# Altium PCB PCB_PowerBoard_7500-0430.PcbDoc (part 1 of 5)
Units mil, origin at the board's own origin, x right, y up, seen from the top; angles counter-clockwise.
Board outline 4000 x 3250 mil, 4 copper layers (Top Layer, Layer 1, Layer 2, Bottom Layer), stack 62.449 mil thick; 205 components, 100 nets, 1585 pads, 235 vias.
Unrouted connection lines stored in the file: 2.
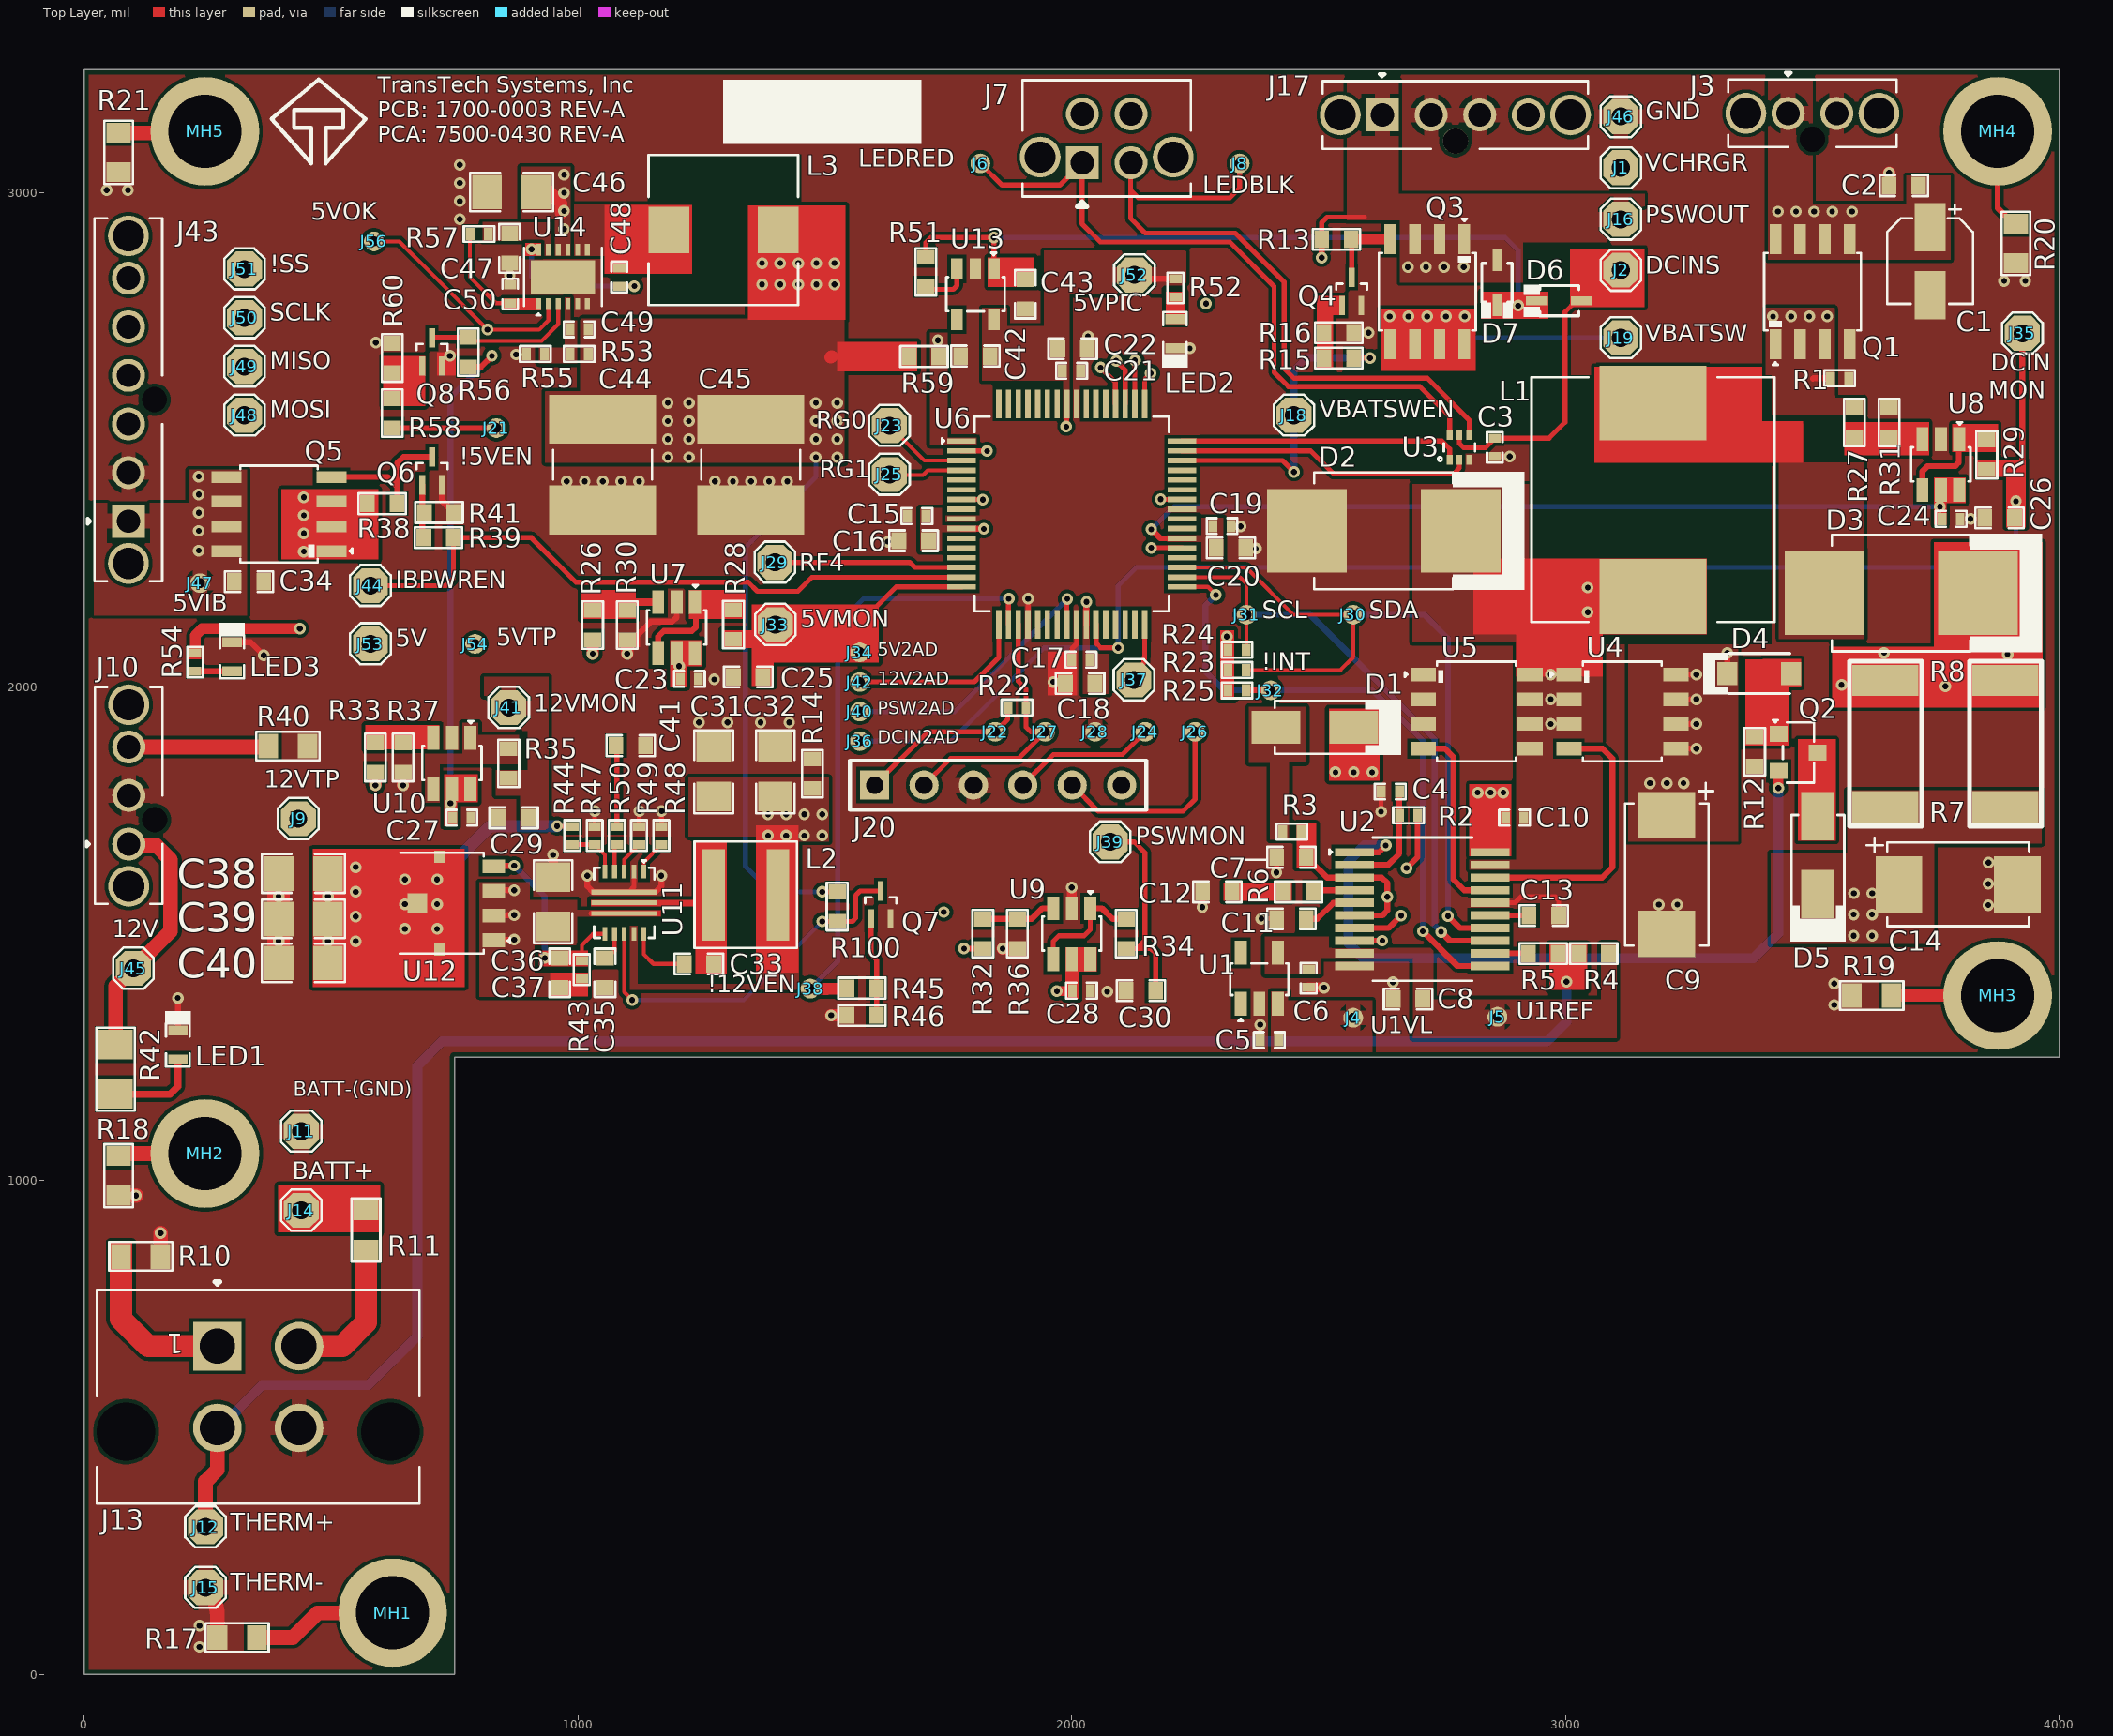
[diagram p0: Top Layer view]
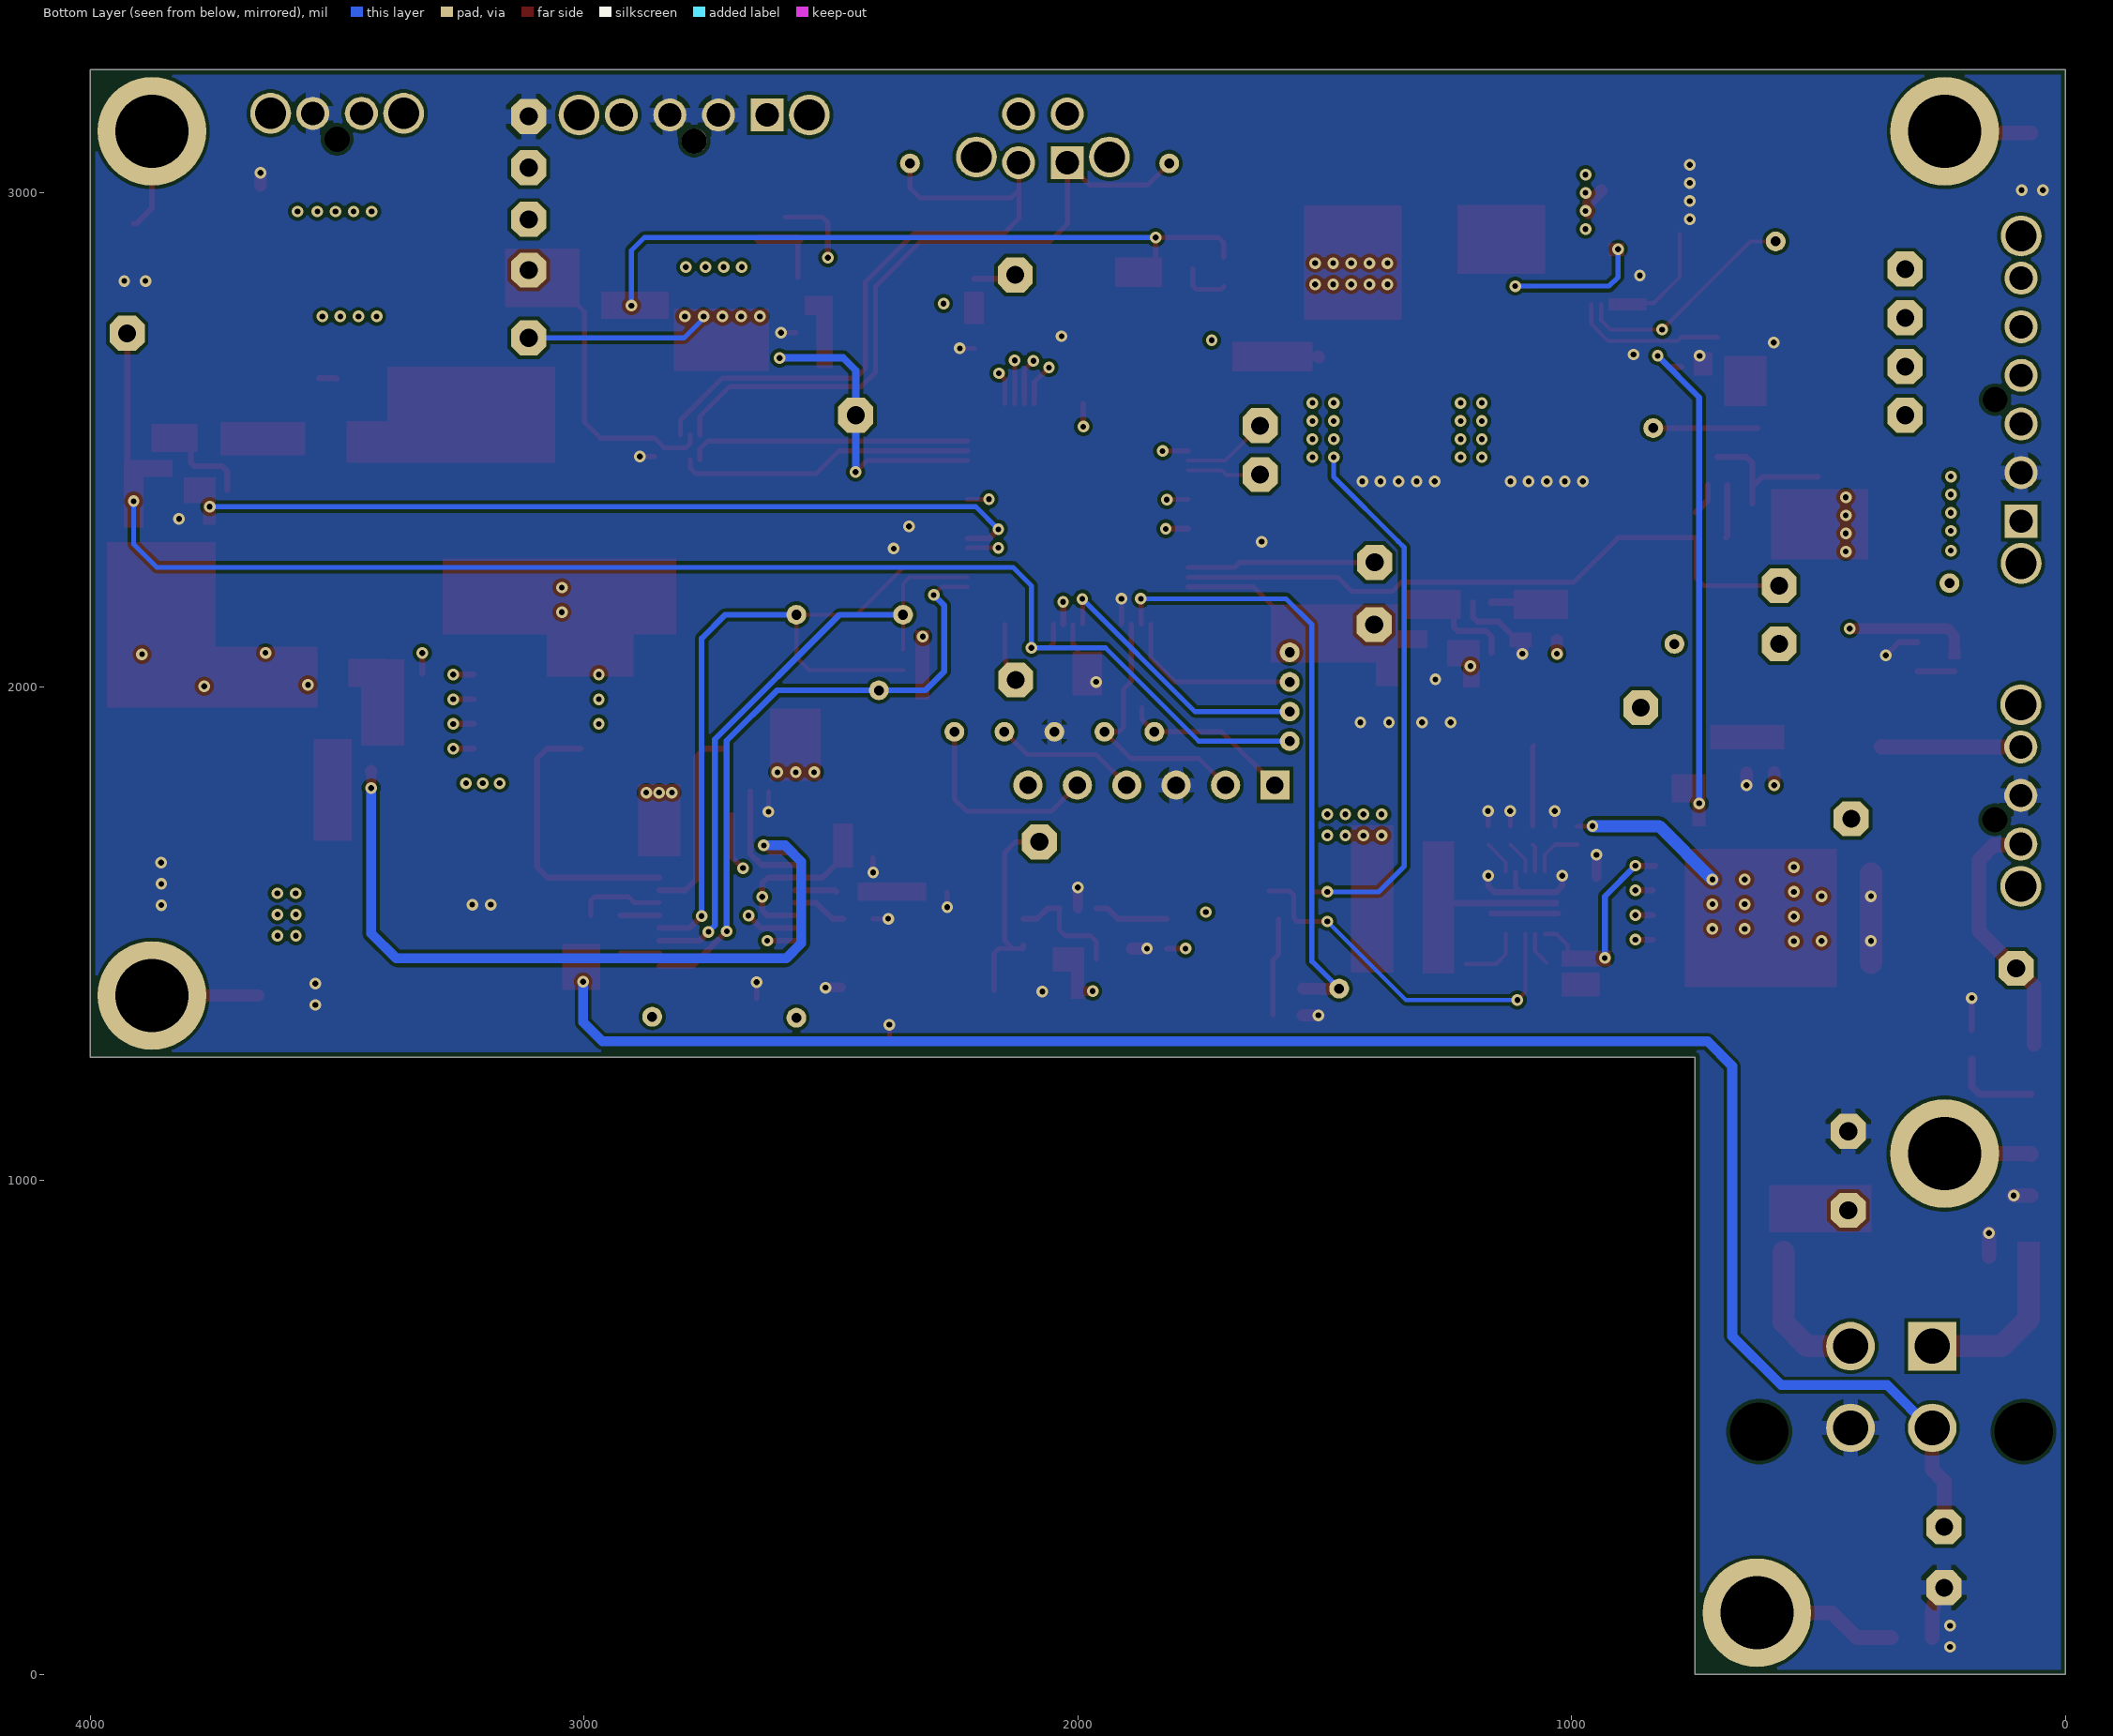
[diagram p1: Bottom Layer view, seen from below]
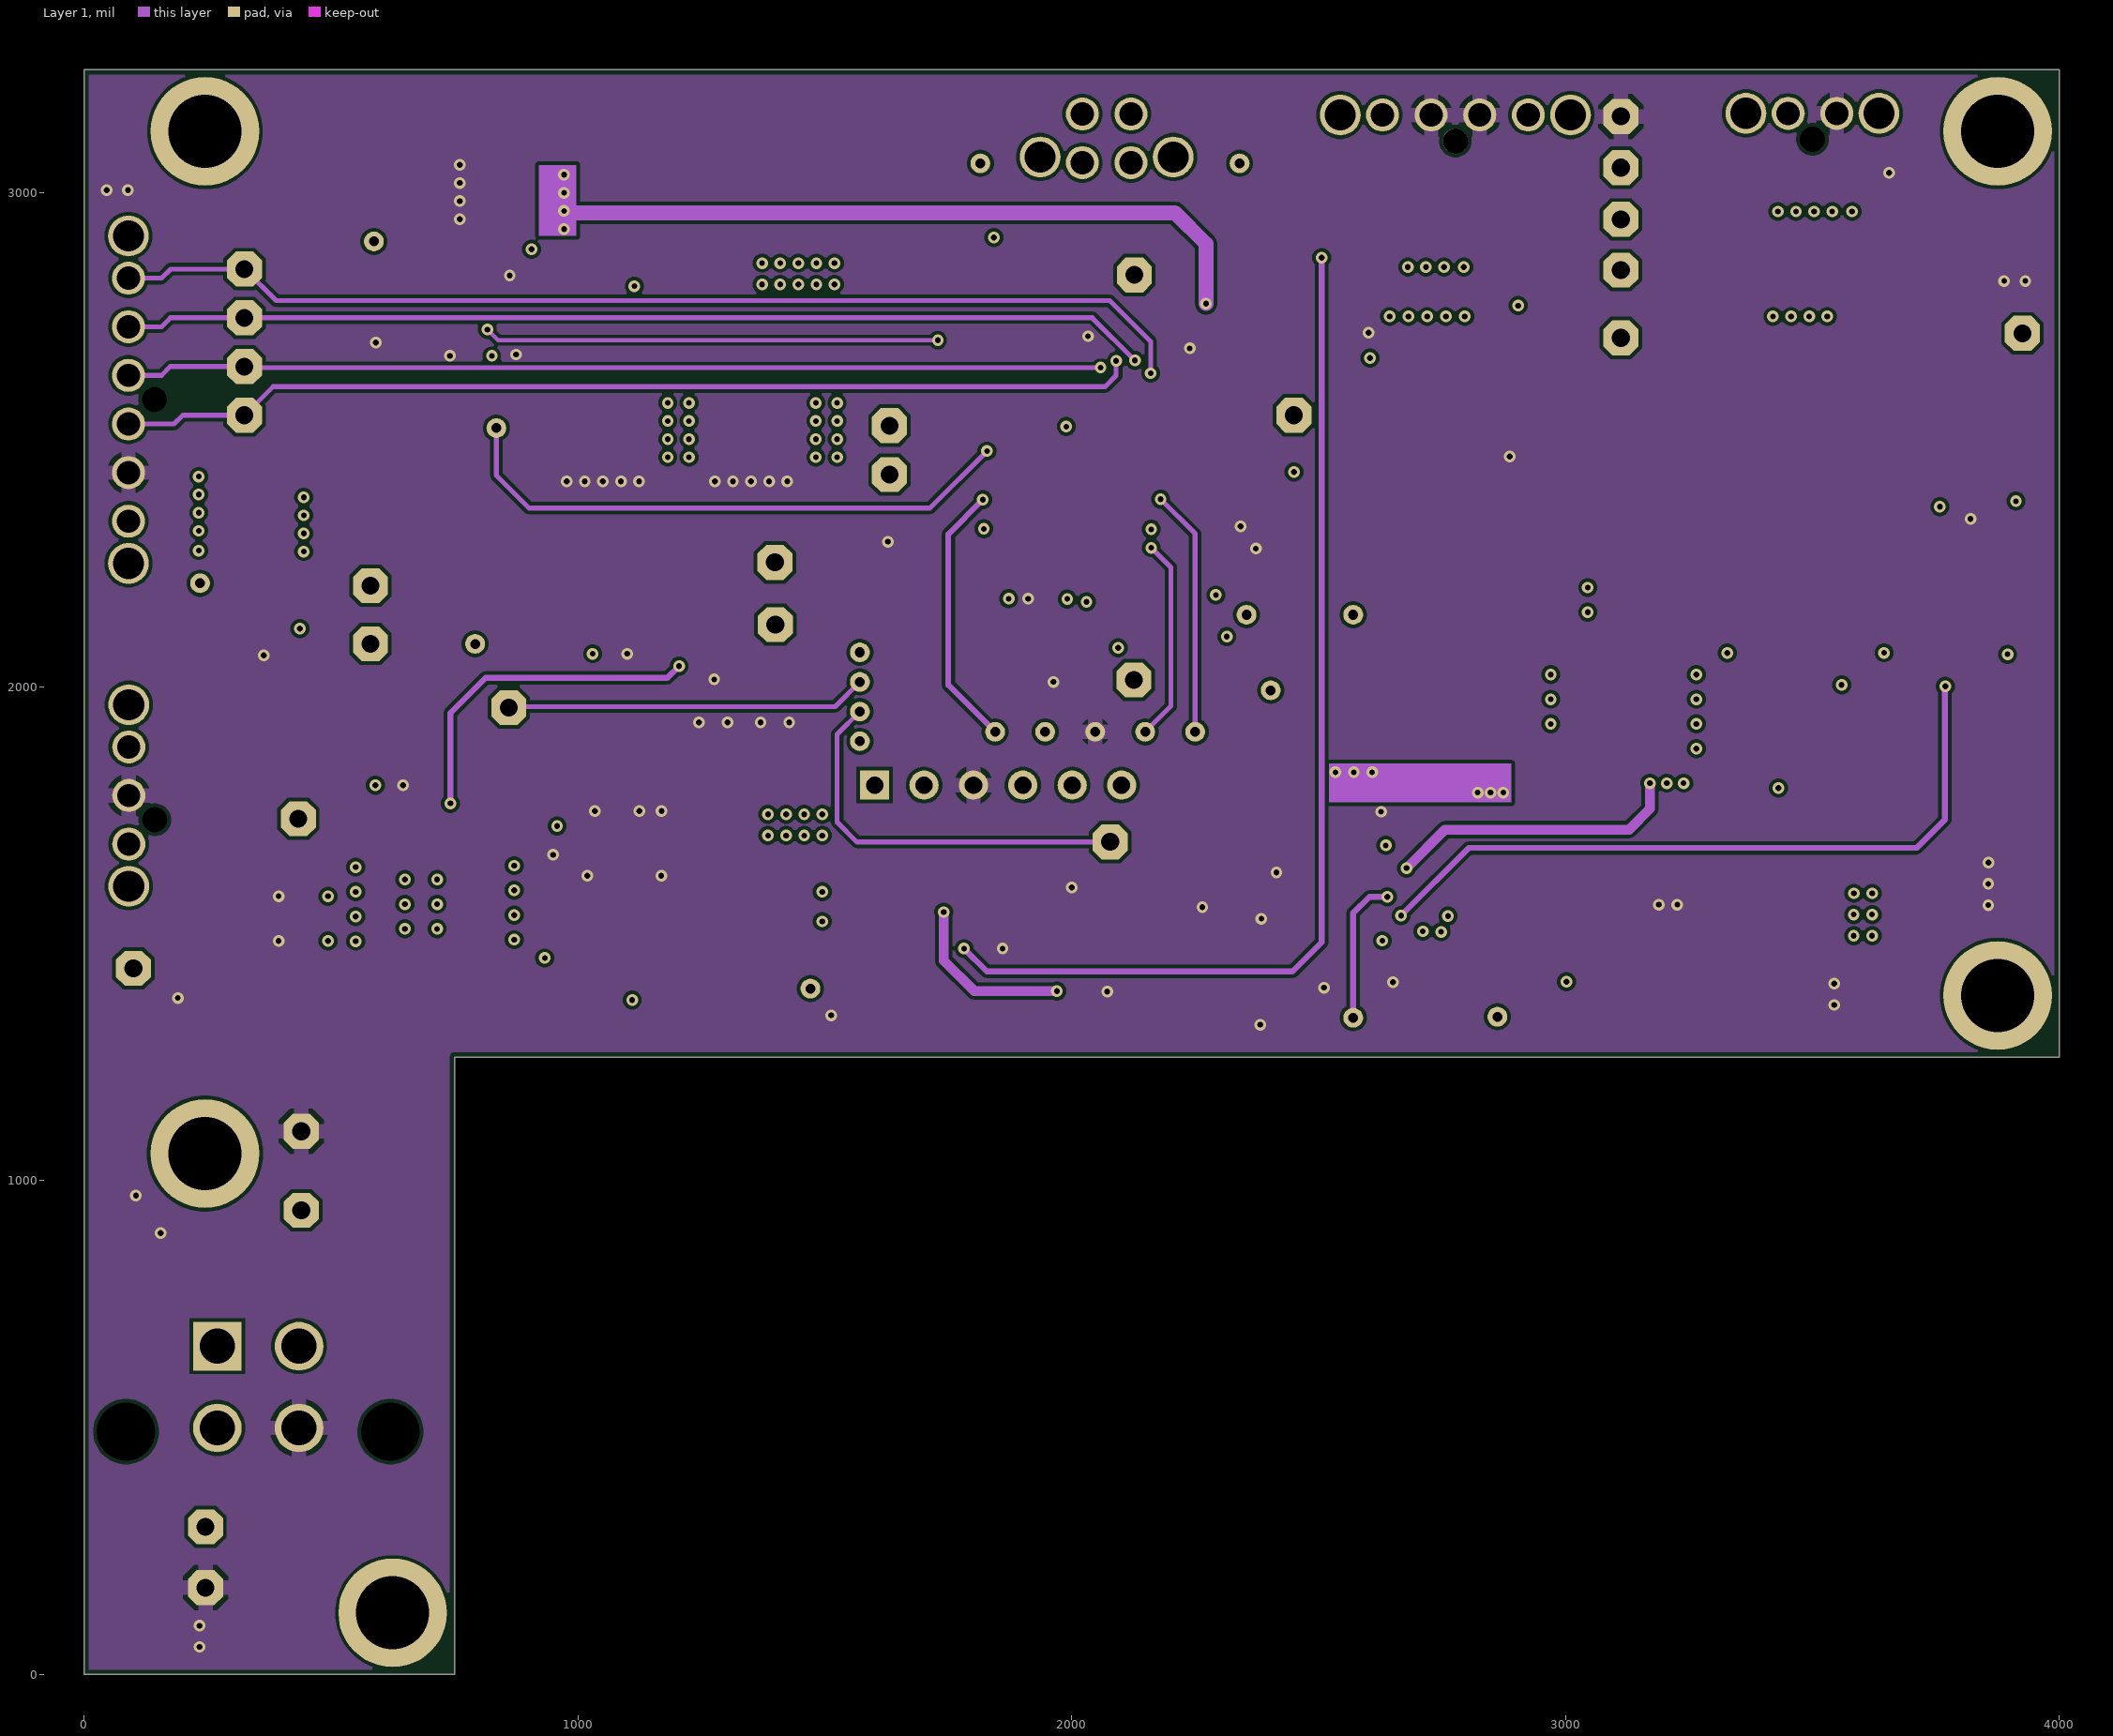
[diagram p2: Layer 1]
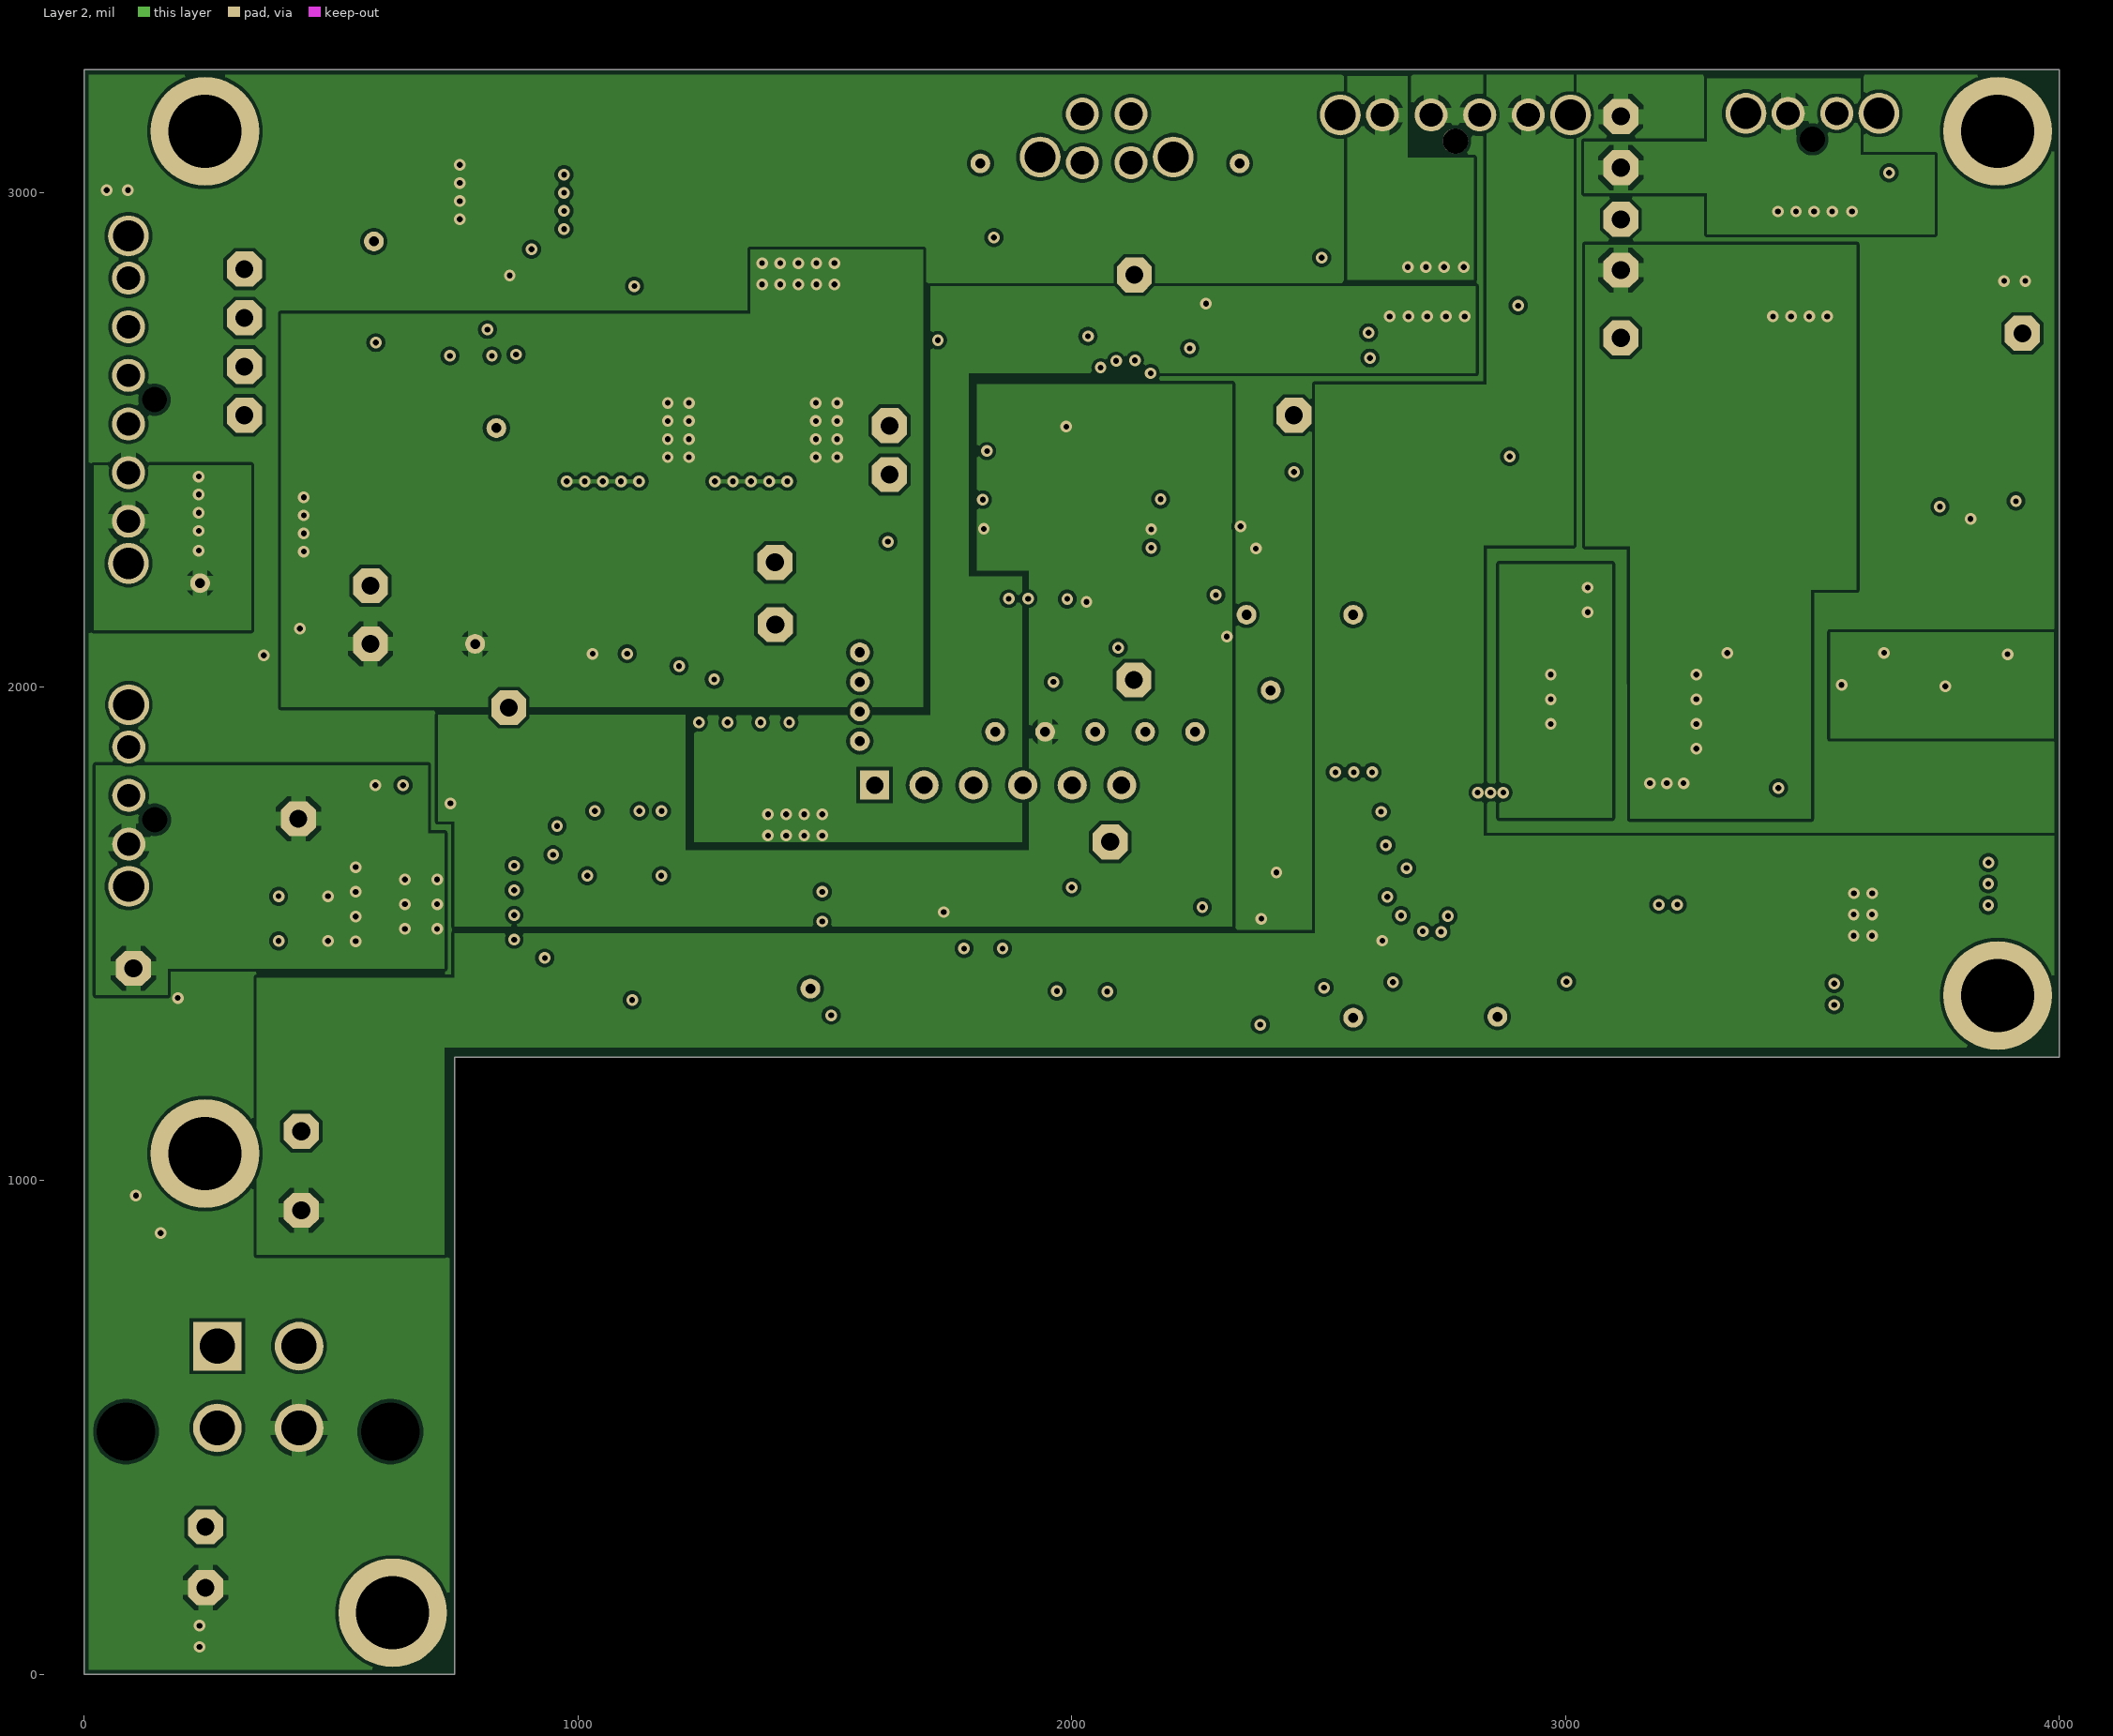
[diagram p3: Layer 2]
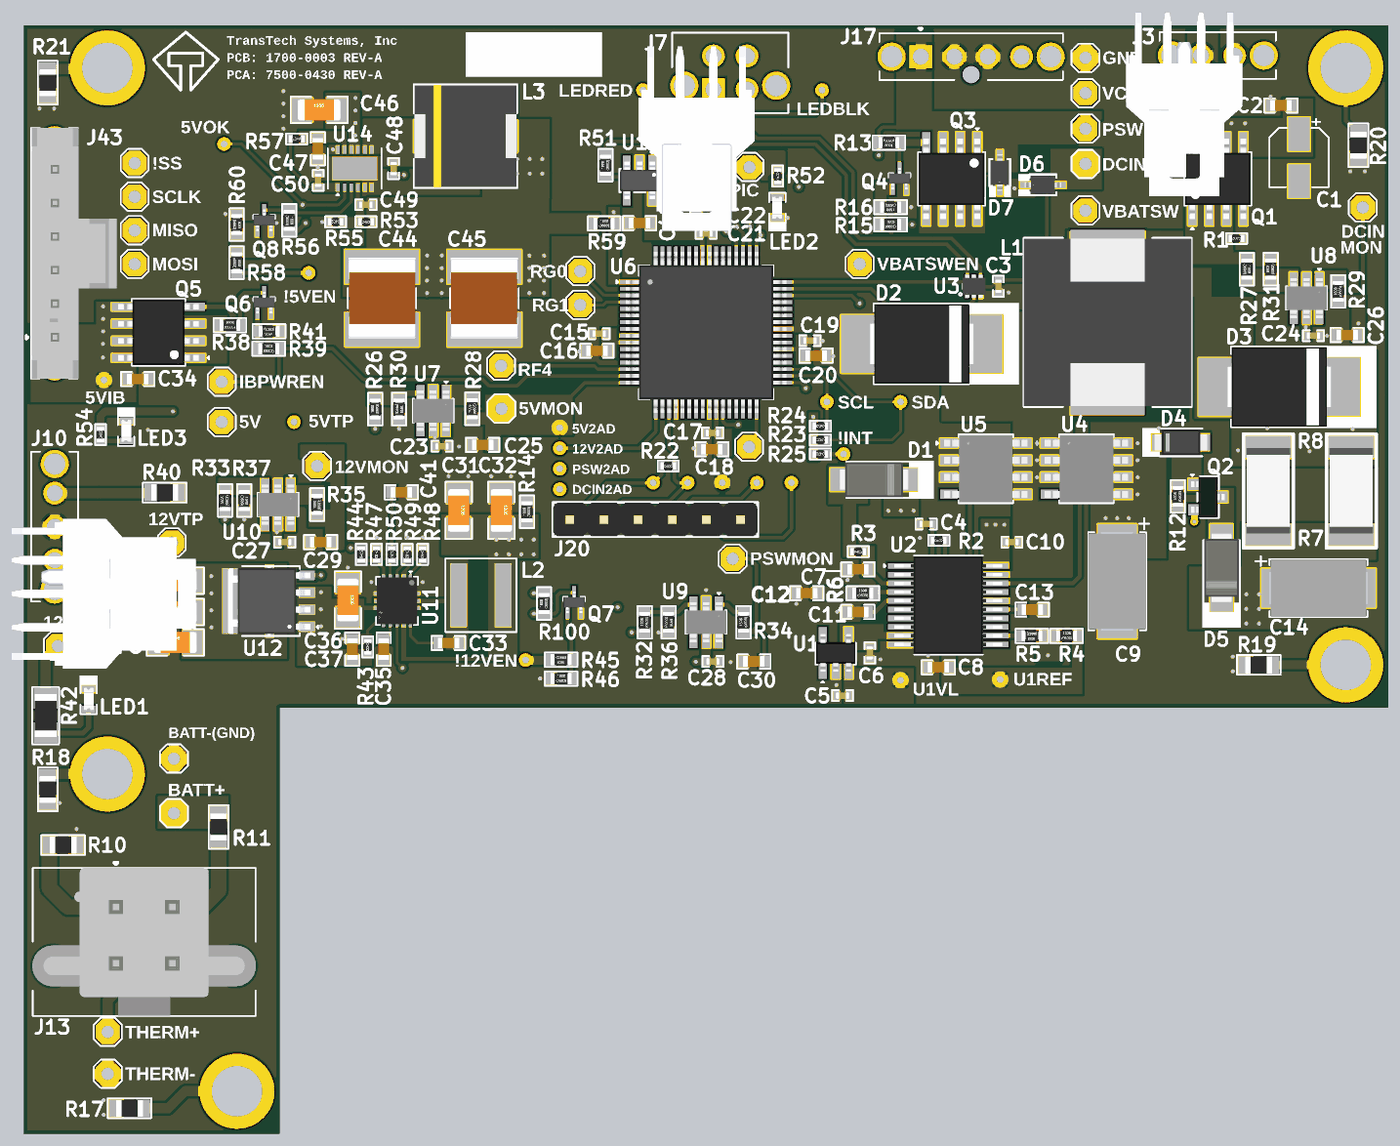
[diagram p6: 3D render of the assembled board from above, using the file's embedded part models]

## Layer stack, top to bottom
Top Solder: solder mask 0.4, Solder Resist, Dk 3.5
Top Layer: signal copper 1.378
Dielectric 2: prepreg 8.2839, PP-006, Dk 4.4
Layer 1: signal copper 0.598
Dielectric 1: core 41.9291, FR-4, Dk 4.6
Layer 2: signal copper 0.598
Dielectric 3: prepreg 8.2839, PP-006, Dk 4.4
Bottom Layer: signal copper 1.378
Bottom Solder: solder mask 0.4, Solder Resist, Dk 3.5

## Board outline
0,0 750,0 750,1250 4000,1250 4000,3250 0,3250

## Design rules (kind name [scope] priority, off if disabled: settings)
BoardOutlineClearance [All] p1: gap=0 ignorepadtopadclearanceinfootprint=FALSE except(10: Poly-OutlineEdge)
Clearance [All] p1: gap=7 ignorepadtopadclearanceinfootprint=FALSE except(0: Arc-Hole Track-Hole SMDPad-Hole THPad-Hole Via-Hole Fill-Hole Poly-Hole Region-Hole Text-Hole; 4: Arc-SMDPad Track-SMDPad SMDPad-SMDPad)
HoleSize [All] p1: absolutevalues=TRUE maxlimit=1000 minlimit=1 maxpercent=80.000 minpercent=20.000
HoleToHoleClearance [All] p1: gap=0 allowstackedmicrovias=TRUE
MinimumSolderMaskSliver [All] p1: minsoldermaskwidth=0
PolygonConnect [All] p1: thpad.connectstyle=Relief thpad.reliefconductorwidth=30 thpad.reliefentries=4 thpad.polygonreliefangle="90 Angle" thpad.airgapwidth=10 smdpad.connectstyle=Direct smdpad.reliefconductorwidth=10 smdpad.reliefentries=4 smdpad.polygonreliefangle="90 Angle" smdpad.airgapwidth=10 via.connectstyle=Direct via.reliefconductorwidth=10 via.reliefentries=4 via.polygonreliefangle="90 Angle" via.airgapwidth=10
RoutingVias [All] p1: holewidth=11.81 width=23.62 viastyle="Through Hole" minholewidth=11.81 minwidth=23.62 maxholewidth=11.81 maxwidth=23.62
SilkToSilkClearance [All] p1: silktosilkclearance=0
SilkToSolderMaskClearance [IsPad] p1: minsilkscreentomaskgap=0 clearancetoexposedcopper=TRUE
SolderMaskExpansion [All] p1: expansion=4 istentingtop=FALSE
UnRoutedNet [All] p1: checkbadconnections=TRUE
Width [All] p1: maxlimit=100 minlimit=8 preferedwidth=10
24 further rules are at their usual default settings.

## Classes and differential pairs
component class Regulator_Sheet: C31 C32 C33 C34 C35 C36 C37 C38 C39 C40 C41 C42 C43 C44 C45 C46 C47 C48 C49 C50 D6 D7 J9 J10 J43 J44 J45 J47 J48 J49 J50 J51 J52 J53 J54 J56 L2 L3 LED1 LED2 LED3 Q5 Q6 Q7 Q8 R38 R39 R40 R41 R42 R43 R44 R45 R46 R47 R48 R49 R50 R51 R52 R53 R54 R55 R56 R57 R58 R59 R60 R100 U11 U12 U13 U14
component class Power_Sheet: C1 C2 C3 C4 C5 C6 C7 C8 C9 C10 C11 C12 C13 C14 D1 D2 D3 D4 D5 J1 J2 J3 J4 J5 J6 J7 J8 J11 J12 J13 J14 J15 J16 J17 J18 J19 J46 L1 Q1 Q2 Q3 Q4 R1 R2 R3 R4 R5 R6 R7 R8 R10 R11 R12 R13 R14 R15 R16 U1 U2 U3 U4 U5
component class Controller_Sheet: C15 C16 C17 C18 C19 C20 C21 C22 C23 C24 C25 C26 C27 C28 C29 C30 J20 J21 J22 J23 J24 J25 J26 J27 J28 J29 J30 J31 J32 J33 J34 J35 J36 J37 J38 J39 J40 J41 J42 MH1 MH2 MH3 MH4 MH5 R17 R18 R19 R20 R21 R22 R23 R24 R25 R26 R27 R28 R29 R30 R31 R32 R33 R34 R35 R36 R37 U6 U7 U8 U9 U10

## Components (designator, comment, footprint, x,y, rotation, side; value= is the part's Value field where it differs from the comment)
C1 "10uF" EEEFK1E100R_ 3738,2862 r270 top locked
C2 "0.1uF" Cap-0603 3685,3015 r0 top locked
C3 "0.1uF" Cap-0402 2857,2485 r270 top locked value=100nF
C4 "0.1uF" Cap-0402 2645,1788 r180 top locked value=100nF
C5 "0.1uF" Cap-0402 2400,1285 r180 top locked value=100nF
C6 "0.1uF" Cap-0402 2480,1410 r270 top locked value=100nF
C7 "1uF" Cap-0603 2445,1655 r180 top locked
C8 "0.1uF" Cap-0603 2681,1368 r0 top locked
C9 "22uF" Case-D 3205,1620 r270 top locked
C10 "0.1uF" Cap-0402 2896.5,1735 r0 top locked value=100nF
C11 "47nF" Cap-0603 2445,1530 r0 top locked
C12 "0.1uF" Cap-0603 2295,1585 r180 top locked
C13 "22nF" Cap-0603 2956,1537 r180 top locked
C14 "47uF" Case-D 3795,1600 r0 top locked
C15 "0.1uF" Cap-0402 1686.5,2346 r180 top locked value=100nF
C16 "10uF" Cap-0603 1680,2296 r180 top locked
C17 "0.1uF" Cap-0402 2019,2055 r180 top locked value=100nF
C18 "10uF" Cap-0603 2017,2007 r180 top locked
C19 "0.1uF" Cap-0402 2304.5,2325.5 r0 top locked value=100nF
C20 "10uF" Cap-0603 2322.5,2281.5 r0 top locked
C21 "0.1uF" Cap-0402 2000,2640 r0 top locked value=100nF
C22 "10uF" Cap-0603 2002,2685 r0 top locked
C23 "0.1uF" Cap-0402 1226,2016 r0 top locked value=100nF
C24 "0.1uF" Cap-0402 3780.5,2340 r0 top locked value=100nF
C25 "0.1uF" Cap-0603 1345,2020 r180 top locked
C26 "0.1uF" Cap-0603 3879,2342 r180 top locked
C27 "0.1uF" Cap-0402 765,1735 r0 top locked value=100nF
C28 "0.1uF" Cap-0402 2020,1385 r0 top locked value=100nF
C29 "0.1uF" Cap-0603 870,1735 r180 top locked
C30 "0.1uF" Cap-0603 2140,1385 r180 top locked
C31 "22uF" Cap-1206 1275,1828 r270 top locked
C32 "22uF" Cap-1206 1400,1828 r270 top locked
C33 "0.1uF" Cap-0603 1245,1439 r0 top locked
C34 "10uF" Cap-0603 334,2213 r180 top locked
C35 "4.7uF" Cap-0603 1055,1421 r90 top locked
C36 "10uF" Cap-1206 950,1565 r270 top locked
C37 "22nF" Cap-0603 963,1421 r270 top locked
C38 "22uF" Cap-1206 444,1622 r0 top locked
C39 "22uF" Cap-1206 444,1530 r0 top locked
C40 "22uF" Cap-1206 444,1441 r0 top locked
C41 "220pF" Cap-0603 1107,1881 r180 top locked
C42 "4.7uF" Cap-0603 1805,2670 r0 top locked
C43 "1uF" Cap-0603 1906,2795 r90 top locked
C44 "47uF" "SMD 2 J_Lead" 1050,2450 r90 top locked
C45 "47uF" "SMD 2 J_Lead" 1350,2450 r90 top locked
C46 "22uF" Cap-1206 866,3002 r0 top locked
C47 "1uF" Cap-0603 862,2888 r90 top locked
C48 "0.1uF" Cap-0402 1084,2830 r90 top locked value=100nF
C49 "12pF" Cap-0402 1003,2724 r0 top locked
C50 "DNP" Cap-0402 863,2795.5 r270 top locked
D1 "ES1A-13-F" SMA 2492.26,1918 r180 top locked
D2 "B560CQ-13-F" SMC 2632,2316 r180 top locked
D3 "B560CQ-13-F" SMC 3680,2190 r180 top locked
D4 "BZD27C4V3P-E3-08" "DO-219AB (SMF)" 3392,2027 r180 top locked
D5 "ES1A-13-F" SMA 3511,1659.26 r90 top locked
D6 "1SS404,H3F" USC 2988,2776 r0 top locked
D7 "1SS404,H3F" USC 2867,2819 r90 top locked
J1 "Test Point -TH 1.8mm Hole size 0.92mm" "Test Point -TH 1.8mm Hole size 0.92mm"#1 3112,3051.33 r180 top locked
J2 "Test Point -TH 1.8mm Hole size 0.92mm" "Test Point -TH 1.8mm Hole size 0.92mm"#1 3112,2844 r180 top locked
J3 "1053111302" 1053111302 3500,3135 r0 top locked
J4 "Test Point -TH 1.8mm Hole size 0.92mm" "Test Point -TH 1.8mm Hole size 0.92mm"#2 2570,1330 r0 top locked
J5 "Test Point -TH 1.8mm Hole size 0.92mm" "Test Point -TH 1.8mm Hole size 0.92mm"#2 2862,1332 r0 top locked
J6 "Test Point -TH 1.8mm Hole size 0.92mm" "Test Point -TH 1.8mm Hole size 0.92mm"#2 1815,3060 r0 top locked
J7 "105312-1304" 105312-1304 2070.79,3110.79 r0 top
J8 "Test Point -TH 1.8mm Hole size 0.92mm" "Test Point -TH 1.8mm Hole size 0.92mm"#2 2340,3060 r0 top locked
J9 "Test Point -TH 1.8mm Hole size 0.92mm" "Test Point -TH 1.8mm Hole size 0.92mm"#1 434,1733 r0 top locked
J10 "105311-1303" 1053111303 117,1780 r90 top locked
J11 "Test Point -TH 1.8mm Hole size 0.92mm" "Test Point -TH 1.8mm Hole size 0.92mm"#1 440,1100 r0 top locked
J12 "Test Point -TH 1.8mm Hole size 0.92mm" "Test Point -TH 1.8mm Hole size 0.92mm"#1 246,299 r0 top locked
J13 "0462075004" 0462075004 352.72,578.44 r180 top locked
J14 "Test Point -TH 1.8mm Hole size 0.92mm" "Test Point -TH 1.8mm Hole size 0.92mm"#1 440,940 r0 top locked
J15 "Test Point -TH 1.8mm Hole size 0.92mm" "Test Point -TH 1.8mm Hole size 0.92mm"#1 246,176 r0 top locked
J16 "Test Point -TH 1.8mm Hole size 0.92mm" "Test Point -TH 1.8mm Hole size 0.92mm"#1 3112,2946.67 r0 top locked
J17 "105311-1304" 1053111304 2776.93,3131.62 r0 top
J18 "Test Point -TH 1.8mm Hole size 0.92mm" "Test Point -TH 1.8mm Hole size 0.92mm"#1 2450,2550 r0 top locked
J19 "Test Point -TH 1.8mm Hole size 0.92mm" "Test Point -TH 1.8mm Hole size 0.92mm"#1 3112,2706.67 r0 top locked
J20 "X6511WV-06H-C60D30" HDR1X6_ 1601,1801 r0 top
J21 "Test Point -TH 1.8mm Hole size 0.92mm" "Test Point -TH 1.8mm Hole size 0.92mm"#2 835,2524 r0 top locked
J22 "Test Point -TH 1.8mm Hole size 0.92mm" "Test Point -TH 1.8mm Hole size 0.92mm"#2 1845,1909 r0 top locked
J23 "Test Point -TH 1.8mm Hole size 0.92mm" "Test Point -TH 1.8mm Hole size 0.92mm"#1 1631,2529 r0 top locked
J24 "Test Point -TH 1.8mm Hole size 0.92mm" "Test Point -TH 1.8mm Hole size 0.92mm"#2 2148.75,1909 r0 top locked
J25 "Test Point -TH 1.8mm Hole size 0.92mm" "Test Point -TH 1.8mm Hole size 0.92mm"#1 1631,2430 r0 top locked
J26 "Test Point -TH 1.8mm Hole size 0.92mm" "Test Point -TH 1.8mm Hole size 0.92mm"#3 1865,1890 r0 top locked
J27 "Test Point -TH 1.8mm Hole size 0.92mm" "Test Point -TH 1.8mm Hole size 0.92mm"#2 1946.25,1909 r0 top locked
J28 "Test Point -TH 1.8mm Hole size 0.92mm" "Test Point -TH 1.8mm Hole size 0.92mm"#2 2047.5,1909 r0 top locked
J29 "Test Point -TH 1.8mm Hole size 0.92mm" "Test Point -TH 1.8mm Hole size 0.92mm"#1 1399,2252 r0 top locked
J30 "Test Point -TH 1.8mm Hole size 0.92mm" "Test Point -TH 1.8mm Hole size 0.92mm"#2 2570,2146 r0 top locked
J31 "Test Point -TH 1.8mm Hole size 0.92mm" "Test Point -TH 1.8mm Hole size 0.92mm"#2 2354,2146 r0 top locked
J32 "Test Point -TH 1.8mm Hole size 0.92mm" "Test Point -TH 1.8mm Hole size 0.92mm"#2 2403,1993 r0 top locked
J33 "Test Point -TH 1.8mm Hole size 0.92mm" "Test Point -TH 1.8mm Hole size 0.92mm"#1 1400,2126 r0 top locked
J34 "Test Point -TH 1.8mm Hole size 0.92mm" "Test Point -TH 1.8mm Hole size 0.92mm"#2 1571,2070 r0 top locked
J35 "Test Point -TH 1.8mm Hole size 0.92mm" "Test Point -TH 1.8mm Hole size 0.92mm"#1 3925,2716 r0 top locked
J36 "Test Point -TH 1.8mm Hole size 0.92mm" "Test Point -TH 1.8mm Hole size 0.92mm"#2 1571,1890 r0 top locked
J37 "Test Point -TH 1.8mm Hole size 0.92mm" "Test Point -TH 1.8mm Hole size 0.92mm"#1 2126,2014 r0 top locked
J38 "Test Point -TH 1.8mm Hole size 0.92mm" "Test Point -TH 1.8mm Hole size 0.92mm"#2 1471,1389 r0 top
J39 "Test Point -TH 1.8mm Hole size 0.92mm" "Test Point -TH 1.8mm Hole size 0.92mm"#1 2078,1686 r0 top locked
J40 "Test Point -TH 1.8mm Hole size 0.92mm" "Test Point -TH 1.8mm Hole size 0.92mm"#2 1571,1950 r0 top locked
J41 "Test Point -TH 1.8mm Hole size 0.92mm" "Test Point -TH 1.8mm Hole size 0.92mm"#1 860,1958 r0 top locked
J42 "Test Point -TH 1.8mm Hole size 0.92mm" "Test Point -TH 1.8mm Hole size 0.92mm"#2 1571,2010 r0 top locked
J43 "105311-1206" 1053111206 116.38,2581.5 r90 top locked
J44 "Test Point -TH 1.8mm Hole size 0.92mm" "Test Point -TH 1.8mm Hole size 0.92mm"#1 580,2205 r0 top locked
J45 "Test Point -TH 1.8mm Hole size 0.92mm" "Test Point -TH 1.8mm Hole size 0.92mm"#1 100,1430 r0 top locked
J46 "Test Point -TH 1.8mm Hole size 0.92mm" "Test Point -TH 1.8mm Hole size 0.92mm"#1 3112,3155 r180 top locked
J47 "Test Point -TH 1.8mm Hole size 0.92mm" "Test Point -TH 1.8mm Hole size 0.92mm"#4 229,2193 r0 top locked
J48 "Test Point -TH 1.8mm Hole size 0.92mm" "Test Point -TH 1.8mm Hole size 0.92mm"#1 325,2550 r0 top locked
J49 "Test Point -TH 1.8mm Hole size 0.92mm" "Test Point -TH 1.8mm Hole size 0.92mm"#1 325,2648.67 r0 top locked
J50 "Test Point -TH 1.8mm Hole size 0.92mm" "Test Point -TH 1.8mm Hole size 0.92mm"#1 325,2747.33 r0 top locked
J51 "Test Point -TH 1.8mm Hole size 0.92mm" "Test Point -TH 1.8mm Hole size 0.92mm"#1 325,2846 r0 top locked
J52 "Test Point -TH 1.8mm Hole size 0.92mm" "Test Point -TH 1.8mm Hole size 0.92mm"#1 2127,2834 r0 top locked
J53 "Test Point -TH 1.8mm Hole size 0.92mm" "Test Point -TH 1.8mm Hole size 0.92mm"#1 580,2087 r0 top locked
J54 "Test Point -TH 1.8mm Hole size 0.92mm" "Test Point -TH 1.8mm Hole size 0.92mm"#2 792,2087 r0 top locked
J56 "Test Point -TH 1.8mm Hole size 0.92mm" "Test Point -TH 1.8mm Hole size 0.92mm"#2 587,2902 r0 top locked
L1 "22uH" DR127-220-R 3177,2379 r90 top locked
L2 "1.2uH" XAL5030-122MEC 1340,1579 r180 top locked
L3 "3.3uH" DRA74-3R3-R 1295,2925 r0 top locked
LED1 "Emerald" LED-0603 190,1275 r90 top locked
LED2 "Emerald" LED-0603 2209,2715 r270 top locked
LED3 "Emerald" LED-0603 300,2061 r90 top locked
MH1 "4-40 Panhead Mounting Holes" "4-40 Panhead Mounting Holes"#1 625,125 r0 top locked
MH2 "4-40 Panhead Mounting Holes" "4-40 Panhead Mounting Holes"#2 1705,195 r0 top locked
MH3 "4-40 Panhead Mounting Holes" "4-40 Panhead Mounting Holes"#1 3875,1375 r0 top locked
MH4 "4-40 Panhead Mounting Holes" "4-40 Panhead Mounting Holes"#1 3875,3125 r0 top locked
MH5 "4-40 Panhead Mounting Holes" "4-40 Panhead Mounting Holes"#3 1125,600 r0 top locked
Q1 "AO4485" SOIC-8 3500,2800 r90 top locked
Q2 "BC807-40" SOT-23 3471,1867 r270 top
Q3 "AO4485" SOIC-8 2720,2800 r270 top locked
Q4 "MMBT2222ATT3G" MMBT2222ATT3G 2586.68,2772.31 r90 top locked
Q5 "AO4485" SOIC-8 395,2350 r180 top locked
Q6 "MMBT2222ATT3G" MMBT2222ATT3G 724.37,2409 r90 top locked
Q7 "MMBT2222ATT3G" MMBT2222ATT3G 1633,1530 r90 top locked
Q8 "MMBT2222ATT3G" MMBT2222ATT3G 724.37,2650 r90 top locked
R1 "10K" Res-0402 3555,2625 r180 top
R2 "10R" Res-0402 2682,1740 r0 top
R3 "10R" Res-0402 2446,1707 r0 top
R4 "10K" Res-0603 3057,1460 r180 top locked value=10kR
R5 "10K" Res-0603 2955,1460 r0 top locked value=10kR
R6 "10K" Res-0603 2459,1585 r180 top locked value=10kR
R7 "90mR" RES-2512 3648,1885 r270 top locked
R8 "90mR" RES-2512 3891,1885 r270 top locked
R10 "0R" Res-0805 115,846.69 r180 top locked
R11 "0R" Res-0805 571,900 r270 top locked
R12 "10K" Res-0603 3383,1869 r270 top value=10kR
R13 "10K" Res-0603 2536,2906 r0 top locked value=10kR
R14 "10K" Res-0603 1475,1824 r270 top locked value=10kR
R15 "1K" Res-0603 2541,2666 r180 top locked
R16 "10K" Res-0603 2541,2717 r0 top locked value=10kR
R17 "0R" Res-0805 310,75 r0 top locked
R18 "0R" Res-0805 70,1010 r90 top locked
R19 "0R" Res-0805 3620,1375 r0 top locked
R20 "0R" Res-0805 3912,2898 r90 top locked
R21 "0R" Res-0805 70,3082 r90 top locked
R22 "10K" Res-0402 1889,1958 r0 top locked
R23 "10K" Res-0402 2335,2034 r180 top locked
R24 "10K" Res-0402 2335,2075 r180 top locked
R25 "10K" Res-0402 2335,1993 r180 top locked
R26 "10K" Res-0603 1030,2125 r270 top locked value=10kR
R27 "30K" Res-0603 3585,2535 r90 top
R28 "100R" Res-0603 1315,2126 r270 top locked
R29 "100R" Res-0603 3853,2470 r270 top locked
R30 "15K" Res-0603 1100,2125 r90 top locked value=15kR
R31 "10K" Res-0603 3655,2535 r270 top locked value=10kR
R32 "18K" Res-0603 1820,1500 r270 top locked
R33 "30K" Res-0603 590,1857 r270 top
R34 "100R" Res-0603 2110,1500 r270 top locked
R35 "100R" Res-0603 860,1845 r270 top locked
R36 "10K" Res-0603 1890,1500 r90 top locked value=10kR
R37 "10K" Res-0603 646,1857 r90 top value=10kR
R38 "10K" Res-0603 604,2371 r180 top locked value=10kR
R39 "1K" Res-0603 718,2302 r180 top locked
R40 "0R" Res-0805 413,1880 r180 top locked
R41 "10K" Res-0603 719,2353 r0 top locked value=10kR
R42 "4.64K" Res-1206 64,1226 r90 top locked
R43 "133K" Res-0402 1008,1427.5 r270 top locked
R44 "732K" Res-0402 989,1699.03 r90 top locked
R45 "1K" Res-0603 1575,1390 r0 top locked
R46 "10K" Res-0603 1575,1335 r180 top locked value=10kR
R47 "80.6K" Res-0402 1034,1699.03 r270 top locked
R48 "174K" Res-0402 1169,1699.03 r270 top locked
R49 "86.6K" Res-0402 1124,1699.03 r270 top locked
R50 "133K" Res-0402 1079,1699.03 r270 top locked
R51 "10K" Res-0603 1705,2840 r270 top locked value=10kR
R52 "1.15K" Res-0402 2210,2808 r90 top locked
R53 "499K" Res-0402 1003,2674 r0 top locked
R54 "1.15K" Res-0402 225,2050 r90 top locked
R55 "95.3K" Res-0402 914,2674 r180 top locked
R56 "10K" Res-0603 778,2678 r90 top locked value=10kR
R57 "DNP" Res-0402 800,2917 r180 top locked
R58 "1K" Res-0603 624,2554 r90 top locked
R59 "10K" Res-0603 1701,2669 r180 top locked value=10kR
R60 "10K" Res-0603 624,2666 r90 top locked value=10kR
R100 "10K" Res-0603 1525,1555 r270 top locked value=10kR
U1 "ADR364AUJZ-REEL7" TSOT-23-5 2380,1410 r90 top locked
U2 "MAX1647EAP+" SSOP-20-208mil 2710,1550 r0 top locked
U3 "DRV8220DRLR" SOT-563 2785,2485 r90 top locked
U4 "DMS3015SSS-13" SOP-8 3115,1950 r0 top locked
U5 "DMS3015SSS-13" SOP-8 2820,1950 r0 top locked
U6 "PIC18F6627T-E/PT" "64-TQFP (10x10)" 2000,2350 r0 top locked
U7 "OPA363AIDBVR" SOT-23-6 1200,2120 r270 top locked
U8 "OPA363AIDBVR" SOT-23-6 3760,2450 r270 top locked
U9 "OPA363AIDBVR" SOT-23-6 2000,1500 r270 top locked
U10 "OPA363AIDBVR" SOT-23-6 745,1845 r270 top locked
U11 "TPS611781RNWT" VQFN-13-HR(3x3.5) 1094,1562.65 r270 top locked
U12 "SI7145DP-T1-GE3" PowerPAK-SO-8 752.54,1562 r180 top locked
U13 "LD2981CM50TR" SOT-23-5 1805,2795 r270 top locked
U14 "ISL85005AFRZ-T7A" "12-DFN (4x3)" 970,2830 r90 top locked

## Footprints (in the part's own frame and the unit in brackets; to place one, negate y for a bottom-side part, rotate by r counter-clockwise, add the part's x,y. Pads: shape width x height; smd on the part's side, far side on the other; paste and mask are expansions set on the pad)
"4-40 Panhead Mounting Holes"#1 [mil]
  round 220 hole 148: MH(0,0)
"4-40 Panhead Mounting Holes"#2 [mil]
  round 220 hole 148: MH(-1460,860)
"4-40 Panhead Mounting Holes"#3 [mil]
  round 220 hole 148: MH(-880,2525)
"12-DFN (4x3)" [mm]
  rect 0.6x0.25 smd paste+0 mask+0.051: 1(-1.4,1.25) 2(-1.4,0.75) 3(-1.4,0.25) 4(-1.4,-0.25) 5(-1.4,-0.75) 6(-1.4,-1.25) 7(1.4,-1.25) 8(1.4,-0.75) 9(1.4,-0.25) 10(1.4,0.25) 11(1.4,0.75) 12(1.4,1.25)
  rect 1.7x3.3 smd paste+0 mask+0.051: 13(0,0)
  silkscreen extent -1.98,-2 1.5,2
"64-TQFP (10x10)" [mm]
  rect 1.47x0.28 smd: 1(-5.67,3.75) 2(-5.67,3.25) 3(-5.67,2.75) 4(-5.67,2.25) 5(-5.67,1.75) 6(-5.67,1.25) 7(-5.67,0.75) 8(-5.67,0.25) 9(-5.67,-0.25) 10(-5.67,-0.75) 11(-5.67,-1.25) 12(-5.67,-1.75) 13(-5.67,-2.25) 14(-5.67,-2.75) 15(-5.67,-3.25) 16(-5.67,-3.75) 33(5.67,-3.75) 34(5.67,-3.25) 35(5.67,-2.75) 36(5.67,-2.25) 37(5.67,-1.75) 38(5.67,-1.25) 39(5.67,-0.75) 40(5.67,-0.25) 41(5.67,0.25) 42(5.67,0.75) 43(5.67,1.25) 44(5.67,1.75) 45(5.67,2.25) 46(5.67,2.75) 47(5.67,3.25) 48(5.67,3.75)
  rect 0.28x1.47 smd: 17(-3.75,-5.67) 18(-3.25,-5.67) 19(-2.75,-5.67) 20(-2.25,-5.67) 21(-1.75,-5.67) 22(-1.25,-5.67) 23(-0.75,-5.67) 24(-0.25,-5.67) 25(0.25,-5.67) 26(0.75,-5.67) 27(1.25,-5.67) 28(1.75,-5.67) 29(2.25,-5.67) 30(2.75,-5.67) 31(3.25,-5.67) 32(3.75,-5.67) 49(3.75,5.67) 50(3.25,5.67) 51(2.75,5.67) 52(2.25,5.67) 53(1.75,5.67) 54(1.25,5.67) 55(0.75,5.67) 56(0.25,5.67) 57(-0.25,5.67) 58(-0.75,5.67) 59(-1.25,5.67) 60(-1.75,5.67) 61(-2.25,5.67) 62(-2.75,5.67) 63(-3.25,5.67) 64(-3.75,5.67)
  silkscreen extent -6.68,-5 5,5, body extent -5.99,-5.99 5.99,5.99, height 1.2
105312-1304 [mm]
  rect 1.7x1.7 / inner round 1.7 / far side rect 1.7x1.7 hole 1.2 mask+0.076: 1(-1.25,-1.25)
  round 1.7 hole 1.2 mask+0.076: 2(1.25,-1.25) 3(-1.25,1.25) 4(1.25,1.25)
  round 2.1 hole 1.6 mask+0.076: S1(-3.42,-0.96) S2(3.42,-0.96)
  silkscreen extent -4.33,-3.53 4.33,2.99, body extent -4.33,-5.85 4.33,2.99, height 10.51
0462075004 [mm]
  rect 2.5x2.5 hole 1.8 mask+0.076: 1(2.1,-2.195)
  round 2.5 hole 1.8 mask+0.076: 2(-2.1,-2.195) 3(2.1,2.004) 4(-2.1,2.004)
  round 0 hole 3 unplated mask+0.076: ""(-6.8,2.195) ""(6.8,2.195)
  silkscreen extent -8.3,-5.51 8.3,5.9, body extent -8.33,-5.1 8.33,5.9, height 13.8
1053111206 [mm]
  rect 1.7x1.7 / inner round 1.7 / far side rect 1.7x1.7 hole 1.2 mask+0.076: 1(-6.25,0.67)
  round 1.7 hole 1.2 mask+0.076: 2(-3.75,0.67) 3(-1.25,0.67) 4(1.25,0.67) 5(3.75,0.67) 6(6.25,0.67)
  round 2.1 hole 1.6 mask+0.076: S1(-8.42,0.67) S2(8.42,0.67)
  round 0 hole 1.3 unplated mask+0.076: ""(0,-0.67)
  silkscreen extent -9.33,-1.07 9.33,2.77, body extent -9.33,-3.97 9.33,2.37, height 10.53
1053111302 [mm]
  round 1.7 hole 1.2 mask+0.076: 1(-1.25,0.67) 2(1.25,0.67)
  round 2.1 hole 1.6 mask+0.076: S1(-3.42,0.67) S2(3.42,0.67)
  round 0 hole 1.3 unplated mask+0.076: ""(0,-0.67)
  silkscreen extent -4.33,-1.07 4.33,2.75, body extent -4.33,-3.91 4.33,2.43, height 10.51
1053111303 [mm]
  round 1.7 hole 1.2 mask+0.076: 1(-2.5,0.67) 2(0,0.67) 3(2.5,0.67)
  round 2.1 hole 1.6 mask+0.076: S1(-4.67,0.67) S2(4.67,0.67)
  round 0 hole 1.3 unplated mask+0.076: ""(-1.25,-0.67)
  silkscreen extent -5.58,-1.07 5.58,2.83, body extent -5.58,-3.94 5.58,2.4, height 10.51
1053111304 [mm]
  rect 1.7x1.7 / inner round 1.7 / far side rect 1.7x1.7 hole 1.2 mask+0.076: 1(-3.75,0.67)
  round 1.7 hole 1.2 mask+0.076: 2(-1.25,0.67) 3(1.25,0.67) 4(3.75,0.67)
  round 2.1 hole 1.6 mask+0.076: S1(-5.92,0.67) S2(5.92,0.67)
  round 1.3 hole 1.3 unplated mask+0.076: ""(0,-0.67)
  silkscreen extent -6.83,-1.07 6.83,2.78
Cap-0402 [mil]
  rect 18x25 smd mask+2.36: 1(-18.5,0) 2(18.5,0)
  silkscreen extent -31,-16 31,16, body extent -20,-10 20,10, height 19
Cap-0603 [mil]
  rect 30x35 smd mask+2.36: 1(-30,0) 2(30,0)
  silkscreen extent -49,-21 49,21, body extent -32,-16 31,16, height 34
Cap-1206 [mil] "SMD 1206"
  rect 60x70 smd: 1(-50,0) 2(50,0)
  silkscreen extent -84,-39 84,39, body extent -63,-31 63,32, height 39
Case-D [mm]
  rect 2.4x2.9 smd: 1(-3.05,0) 2(3.05,0)
  silkscreen extent -4.7,-2.15 3.65,2.39, body extent -3.65,-2.16 3.65,2.14, height 4
"DO-219AB (SMF)" [mil]
  rect 41x47 smd: 1(-64.5,0) 2(64.5,0)
  silkscreen extent -62,-42 113,42, body extent -77,-37 77,37, height 43
DR127-220-R [mm]
  rect 3.85x5.5 smd: 1(-4.975,0) 2(4.975,0)
  silkscreen extent -6.3,-6.25 6.3,6.25, body extent -6.25,-6.25 6.25,6.25, height 8
DRA74-3R3-R [mm]
  rect 2.1x2.4 smd: 1(-2.8,0) 2(2.8,0)
  silkscreen extent -3.86,-3.86 3.84,3.86, body extent -3.8,-3.8 3.8,3.8, height 4.34
EEEFK1E100R_ [mm]
  rect 2.5x1.6 smd: 1(-1.75,0) 2(1.75,0)
  silkscreen extent -2.9,-2.21 2.2,2.21, body extent -2.5,-2.15 2.5,2.15, height 5.8
HDR1X6_ [mm] "Connector; Header; 6 Position"
  rect 1.5x1.5 hole 0.9: 1(0,0)
  round 1.5 hole 0.9: 2(2.54,0) 3(5.08,0) 4(7.62,0) 5(10.16,0) 6(12.7,0)
  silkscreen extent -1.27,-1.27 13.97,1.27, body extent -1.27,-1.24 13.97,1.25, height 8.54
LED-0603 [mm]
  rect 0.5x1 smd: 1(-0.75,0) 2(0.75,0)
  silkscreen extent -1.12,-0.66 1.75,0.66, body extent -0.82,-0.37 0.82,0.36, height 0.68
MMBT2222ATT3G [mm]
  rect 0.99x0.3 smd: 1(0,1) 2(0,0) 3(1.44,0.5)
  silkscreen extent 0.82,-0.3 1.12,1.3, body extent -0.08,-0.3 1.52,1.3, height 0.9
PowerPAK-SO-8 [mm]
  rect 1.15x0.7 smd paste+0 mask+0.051: 1(-1.963,1.905) 2(-1.967,0.635) 3(-1.967,-0.635) 4(-1.963,-1.905)
  rect 1x1 smd: 5_6(1.967,0)
  rect 0.595x0.61 smd paste+0 mask+0.051: 7(0.813,2.388) 8(0.813,-2.388)
  Top Layer region: 4.317,-2.4 4.317,2.4 2.667,2.4 2.667,2.15 -0.383,2.15 -0.383,-2.15 2.667,-2.15 2.667,-2.4 4.317,-2.4
  silkscreen extent -2.8,-2.6 2.87,2.6, body extent -2.24,-2.57 3.91,2.57, height 1.24
Res-0402 [mil]
  rect 18x25 smd mask+2.17: 1(-18.5,0) 2(18.5,0)
  silkscreen extent -32,-17 32,16, body extent -23,-11 23,11, height 16
Res-0603 [mil]
  rect 30x35 smd: 1(-30,0) 2(30,0)
  silkscreen extent -48,-21 48,21, body extent -31,-17 31,17, height 18
Res-0805 [mil] "SMD 0805"
  rect 40x50 smd: 1(-40,0) 2(40,0)
  silkscreen extent -64,-29 64,29, body extent -39,-25 39,24, height 24
Res-1206 [mil]
  rect 60x70 smd: 1(-50,0) 2(50,0)
  silkscreen extent -84,-39 84,39, body extent -63,-31 63,31, height 24
RES-2512 [mm]
  rect 1.6x3.4 smd: 1(-3.25,0) 2(3.25,0)
  silkscreen extent -4.24,-1.85 4.24,1.85, body extent -3.17,-1.63 3.18,1.63, height 0.58
SMA [mm]
  rect 2.5x1.7 smd: 1(-2,0) 2(2,0)
  silkscreen extent -4.45,-1.42 2.06,1.42, body extent -2.6,-1.3 2.6,1.3, height 2.4
SMC [mm]
  rect 4.1x4.3 smd: 1(-3.95,0) 2(3.95,0)
  silkscreen extent -7.24,-3.05 3.58,3.05, body extent -3.9,-2.95 3.9,2.95, height 2.41
"SMD 2 J_Lead" [mm]
  rect 2.53x5.51 smd: 1(-2.336,0) 2(2.336,0)
  silkscreen extent -0.75,-2.55 0.75,2.55, body extent -3,-2.5 3,2.5, height 5.5
SOIC-8 [mm]
  rect 1.55x0.6 smd: 1(-2.7,1.905) 2(-2.7,0.635) 3(-2.7,-0.635) 4(-2.7,-1.905) 5(2.7,-1.905) 6(2.7,-0.635) 7(2.7,0.635) 8(2.7,1.905)
  silkscreen extent -3.76,-2.49 1.99,2.49, body extent -3,-2.45 3,2.45, height 1.7
SOP-8 [mm]
  rect 1.3x0.7 smd: 1(-2.75,1.905) 2(-2.75,0.635) 3(-2.75,-0.635) 4(-2.75,-1.905) 5(2.75,-1.905) 6(2.75,-0.635) 7(2.75,0.635) 8(2.75,1.905)
  silkscreen extent -3.69,-2.57 2.03,2.57, body extent -3.1,-2.5 3.1,2.5, height 1.76
SOT-23 [mm] "TRANS NPN 40V 0.6A SOT23"
  rect 0.82x0.92 smd: 1(-0.95,-1) 2(0.95,-1) 3(0,1)
  silkscreen extent -1.68,-1.3 1.55,0.81, body extent -1.5,-1.25 1.5,1.25, height 1.05
SOT-23-5 [mm]
  rect 1.1x0.6 smd: 1(-1.3,0.95) 2(-1.3,0) 3(-1.3,-0.95) 4(1.3,-0.95) 5(1.3,0.95)
  silkscreen extent -2.13,-1.5 0.88,1.5, body extent -1.4,-1.45 1.4,1.45, height 1.45
SOT-23-6 [mm]
  rect 1.22x0.62 smd: 1(-1.31,0.95) 2(-1.31,0) 3(-1.31,-0.95) 4(1.31,-0.95) 5(1.31,0) 6(1.31,0.95)
  silkscreen extent -2.18,-1.52 0.86,1.52, body extent -1.5,-1.5 1.5,1.5, height 1.47
SOT-563 [mm]
  rect 0.5x0.3 smd: 1(-0.638,0.5) 2(-0.638,0) 3(-0.638,-0.5) 4(0.638,-0.5) 5(0.638,0) 6(0.638,0.5)
  silkscreen extent -0.7,-0.8 0.2,1.1, body extent -0.85,-0.85 0.85,0.85, height 0.61
SSOP-20-208mil [mm]
  rect 2x0.42 smd: 1(-3.491,2.925) 2(-3.491,2.275) 3(-3.491,1.625) 4(-3.491,0.975) 5(-3.491,0.325) 6(-3.491,-0.325) 7(-3.491,-0.975) 8(-3.491,-1.625) 9(-3.491,-2.275) 10(-3.491,-2.925) 11(3.491,-2.925) 12(3.491,-2.275) 13(3.491,-1.625) 14(3.491,-0.975) 15(3.491,-0.325) 16(3.491,0.325) 17(3.491,0.975) 18(3.491,1.625) 19(3.491,2.275) 20(3.491,2.925)
  silkscreen extent -4.78,-3.68 2.57,3.68, body extent -4.01,-3.62 4.01,3.63, height 1.95
"Test Point -TH 1.8mm Hole size 0.92mm"#1 [mm]
  oct 1.8x1.8 hole 0.92: 1(0,0)
  silkscreen extent -1.04,-1.04 1.04,1.07
"Test Point -TH 1.8mm Hole size 0.92mm"#2 [mm]
  round 1.016 hole 0.508: 1(0,0)
"Test Point -TH 1.8mm Hole size 0.92mm"#3 [mm]
  round 1.016 hole 0.508: 1(9.779,0.483)
"Test Point -TH 1.8mm Hole size 0.92mm"#4 [mm]
  round 1.016 hole 0.508: 1(0.152,0.432)
TSOT-23-5 [mm]
  rect 1.22x0.62 smd: 1(-1.31,0.95) 2(-1.31,0) 3(-1.31,-0.95) 4(1.31,-0.95) 5(1.31,0.95)
  silkscreen extent -2.21,-1.5 0.76,1.5, body extent -1.4,-1.45 1.4,1.45, height 0.95
USC [mil]
  rect 43.75x17.75 smd: 1(-46,6) 2(44.55,6)
  silkscreen extent -73,-27 39,38, body extent -54,-20 52,32, height 43
VQFN-13-HR(3x3.5) [mm]
  rect 0.7x0.25 smd paste+0 mask+0.051: 1(-1.6,1) 2(-1.6,0.5) 3(-1.6,0) 4(-1.6,-0.5) 5(-1.6,-1) 9(1.6,-1) 10(1.6,-0.5) 11(1.6,0) 12(1.6,0.5) 13(1.6,1)
  rect 0.25x3.4 smd paste+0 mask+0.051: 6(-0.55,0) 7(0,0) 8(0.55,0)
  silkscreen extent -2.18,-1.55 1.8,1.55, body extent -1.75,-1.5 1.75,1.5, height 1
XAL5030-122MEC [mm]
  rect 1.18x4.7 smd paste+0 mask+0.051: 1(-1.655,0) 2(1.655,0)
  silkscreen extent -2.64,-2.74 2.64,2.74

## Part data
C1: library part EEEFK1E100R, "CAP ALUM 10UF 20% 25V SMD", Case/Package=Radial, Dielectric Material=Aluminium, ESR (Equivalent Series Resistance)=1.35R, LCSC Part Number=C178538, Leakage Current=3uA, Manufacturer=Panasonic, Manufacturer Part Number=EEE-FK1E100R, Max Operating Temperature=105°C, Min Operating Temperature=-55°C, Package Quantity=1, Ripple Current=90mA, Supplier Part Number 1=PCE3795CT-ND, Tolerance=20%, Voltage=25V, Capacitance=10uF, ComponentLink1Description=http://www.jameco.com/Jameco/Products/ProdDS/1357642.pdf?src-supplier=Jameco, ComponentLink1URL=http://www.jameco.com/Jameco/Products/ProdDS/1357642.pdf?src-supplier=Jameco, ComponentLink2Description=http://www.farnell.com/datasheets/2002520.pdf?src-supplier=Farnell, ComponentLink2URL=http://www.farnell.com/datasheets/2002520.pdf?src-supplier=Farnell, ComponentLink3Description=http://www.farnell.com/datasheets/58258.pdf?src-supplier=Element14, ComponentLink3URL=http://www.farnell.com/datasheets/58258.pdf?src-supplier=Element14, ComponentLink4Description=http://www.mouser.com/ds/2/315/ABA0000CE120-68386.pdf?src-supplier=Mouser, ComponentLink4URL=http://www.mouser.com/ds/2/315/ABA0000CE120-68386.pdf?src-supplier=Mouser, ComponentLink5Description=http://uk.rs-online.com/webdocs/139e/0900766b8139e400.pdf?src-supplier=RSComponents, ComponentLink5URL=http://uk.rs-online.com/webdocs/139e/0900766b8139e400.pdf?src-supplier=RSComponents, ComponentLink6Description=http://www.farnell.com/datasheets/2813657.pdf?src-supplier=Farnell, ComponentLink6URL=http://www.farnell.com/datasheets/2813657.pdf?src-supplier=Farnell, ComponentLink7Description=http://www.farnell.com/datasheets/2002520.pdf?src-supplier=Element14, ComponentLink7URL=http://www.farnell.com/datasheets/2002520.pdf?src-supplier=Element14, ComponentLink8Description=http://www.farnell.com/datasheets/1676921.pdf?src-supplier=Element14, ComponentLink8URL=http://www.farnell.com/datasheets/1676921.pdf?src-supplier=Element14, ComponentLink9Description=http://industrial.panasonic.com/www-data/pdf/ABA0000/ABA0000CE120.pdf?src-supplier=Avnet, ComponentLink9URL=http://industrial.panasonic.com/www-data/pdf/ABA0000/ABA0000CE120.pdf?src-supplier=Avnet, ComponentLink10Description=http://industrial.panasonic.com/www-data/pdf/ABA0000/ABA0000CE120.pdf?src-supplier=Future+Electronics, ComponentLink10URL=http://industrial.panasonic.com/www-data/pdf/ABA0000/ABA0000CE120.pdf?src-supplier=Future+Electronics, ComponentLink11Description=https://www.verical.com/server-webapp/html/getDatasheet?partID=134702&src-supplier=Verical, ComponentLink11URL=https://www.verical.com/server-webapp/html/getDatasheet?partID=134702&src-supplier=Verical, ComponentLink12Description=http://industrial.panasonic.com/www-data/pdf/ABA0000/ABA0000CE120.pdf?src-supplier=Avnet+Europe, ComponentLink12URL=http://industrial.panasonic.com/www-data/pdf/ABA0000/ABA0000CE120.pdf?src-supplier=Avnet+Europe, Construction=Cylindrical, Contact Plating=Tin, Diameter=4mm, Height=5.8mm, Height - Seated (Max)=0.24inch, Impedance=1.35R, Lead Free="Lead Free", Length=5.8mm, Life (Hours)=2000Hour, Mount="Surface Mount,PCB", Number of Pins=2, Packaging="Tape and Reel", Polarity=Polar, Pricing 1="1=0.38, 10=0.264, 50=0.1852, 100=0.1587, 500=0.11902, 1000=0.10051 (USD)", Radiation Hardening=No, REACH SVHC="No SVHC", Ripple Current (AC)=90mA, RoHS Compliant=Yes, Series=FK, Stock 1=332, Supplier 1=Digi-Key, Termination=SMD/SMT, Voltage Rating=25V, Voltage Rating (DC)=25V, Width=5.5mm
C2 C8 C12 C25 C26 C29 C30 C33: library part CL10B104KB8NNNC, "CAP CER 0.1UF 50V X7R 0603", Capacitance=100nF, Case Code (Imperial)=0603, Case Code (Metric)=1608, Dielectric=X7R, LCSC Part Number=C1591, Manufacturer=Samsung, Max Operating Temperature=125°C, Min Operating Temperature=-55°C, Package Quantity=1, Supplier Part Number 1=1276-1000-1-ND, Tolerance=10%, Voltage=50V, Case/Package=0603, Category="Ceramic Capacitors", ComponentLink1Description=https://datasheet.ciiva.com/25803/cl10b104kb8nnnc-25803393.pdf?src-supplier=Digi-Key, ComponentLink1URL=https://datasheet.ciiva.com/25803/cl10b104kb8nnnc-25803393.pdf?src-supplier=Digi-Key, ComponentLink2Description=https://datasheet.ciiva.com/26838/getdatasheetpartid-89097-26838411.pdf?src-supplier=Verical, ComponentLink2URL=https://datasheet.ciiva.com/26838/getdatasheetpartid-89097-26838411.pdf?src-supplier=Verical, ComponentLink3Description=https://datasheet.ciiva.com/29198/456651-da-01-en-vs-kondensator-0605-29198839.pdf?src-supplier=Conrad, ComponentLink3URL=https://datasheet.ciiva.com/29198/456651-da-01-en-vs-kondensator-0605-29198839.pdf?src-supplier=Conrad, Construction=Flat, Contact Plating=Tin, Depth=0.8mm, Height=0.8mm, Lead Free="Lead Free", Length=1.6mm, Manufacturer Part Number=CL10B104KB8NNNC, Material=Ceramic, Mount="Surface Mount", Packaging="Tape and Reel", Pricing 1="1=0.10000, 10=0.03000, 50=0.01640, 100=0.01340, 500=0.00954, 1000=0.00750 (USD)", Radiation Hardening=No, RoHS=Yes, RoHS Compliant=Yes, Series=CL, Stock 1=3998791, Supplier 1=Digi-Key, Thickness=0.035inch, Voltage Rating=50V, Voltage Rating (DC)=50V, Width=0.031inch
C3 C4 C5 C6 C10 C15 C17 C19 C21 C23 C24 C27 C28 C48: library part GRM155R71C104KA88D, "CAP CER 0.1UF 16V X7R 0402", Case Code (Imperial)=0402, Case Code (Metric)=1005, Dielectric=X7R, Dielectric Material=Ceramic, Insulation Resistance=10GR, LCSC Part Number=C71629, Manufacturer=Murata, Max Operating Temperature=125°C, Min Operating Temperature=-55°C, Package Quantity=1, Tolerance=10%, Voltage=16V, Case/Package=0402, Category="Ceramic Capacitors", ComponentLink1Description=https://datasheet.ciiva.com/129/grm155r71c104ka88-01-129739.pdf?src-supplier=Digi-Key, ComponentLink1URL=https://datasheet.ciiva.com/129/grm155r71c104ka88-01-129739.pdf?src-supplier=Digi-Key, ComponentLink2Description=https://datasheet.ciiva.com/129/grm155r71c104ka88-01-129740.pdf?src-supplier=Digi-Key, ComponentLink2URL=https://datasheet.ciiva.com/129/grm155r71c104ka88-01-129740.pdf?src-supplier=Digi-Key, ComponentLink3Description=https://datasheet.ciiva.com/18102/getdatasheetpartid-85307-18102905.pdf?src-supplier=Verical, ComponentLink3URL=https://datasheet.ciiva.com/18102/getdatasheetpartid-85307-18102905.pdf?src-supplier=Verical, ComponentLink4Description=https://datasheet.ciiva.com/29199/454098-da-01-en-vs-kondensator-0402-29199799.pdf?src-supplier=Conrad, ComponentLink4URL=https://datasheet.ciiva.com/29199/454098-da-01-en-vs-kondensator-0402-29199799.pdf?src-supplier=Conrad, ComponentLink5Description=https://datasheet.ciiva.com/7937/4360-7937615.pdf?src-supplier=Element14, ComponentLink5URL=https://datasheet.ciiva.com/7937/4360-7937615.pdf?src-supplier=Element14, ComponentLink6Description=https://datasheet.ciiva.com/14116/grmseries-highdielectrictype-eng-14116878.pdf?src-supplier=Distrelec, ComponentLink6URL=https://datasheet.ciiva.com/14116/grmseries-highdielectrictype-eng-14116878.pdf?src-supplier=Distrelec, ComponentLink7Description=https://datasheet.ciiva.com/14103/grmseries-highdielectrictype-eng-14103750.pdf?src-supplier=Distrelec, ComponentLink7URL=https://datasheet.ciiva.com/14103/grmseries-highdielectrictype-eng-14103750.pdf?src-supplier=Distrelec, ComponentLink8Description=https://datasheet.ciiva.com/28534/4360-28534127.pdf?src-supplier=Element14, ComponentLink8URL=https://datasheet.ciiva.com/28534/4360-28534127.pdf?src-supplier=Element14, ComponentLink9Description=https://datasheet.ciiva.com/28534/4360-28534133.pdf?src-supplier=Element14, ComponentLink9URL=https://datasheet.ciiva.com/28534/4360-28534133.pdf?src-supplier=Element14, ComponentLink10Description=https://datasheet.ciiva.com/16199/product-16199000.pdf?src-supplier=Future+Electronics, ComponentLink10URL=https://datasheet.ciiva.com/16199/product-16199000.pdf?src-supplier=Future+Electronics, Depth=0.5mm, Height=0.5mm, Item Type=Capacitor, Lead Free="Lead Free", Length=1mm, Manufacturer Part Number=GRM155R71C104KA88D, Material=Ceramic, Mounting Technology="Surface Mount", Packaging="Tape and Reel", Pins=2, Pricing 1="10000=0.00480, 30000=0.00470, 100000=0.00350, 250000=0.00330 (USD)", Radiation Hardening=No, RoHS=Yes, RoHS Compliant=Yes, Series=GRM, Stock 1=1690322, Supplier 1="Arrow Electronics", Supplier Part Number 1=GRM155R71C104KA88D, Termination=SMD/SMT, Thickness=0.022inch, Voltage Rating=16V, Voltage Rating (DC)=16V, Width=0.02inch
C7 C43 C47: library part CC0603KRX5R8BB105, "CAP CER 1UF 25V X5R 0603", Case Code (Imperial)=0603, Case Code (Metric)=1608, Dielectric=X5R, LCSC Part Number=C14664, Manufacturer=Yageo, Max Operating Temperature=85°C, Min Operating Temperature=-55°C, Package Quantity=1, Supplier Part Number 1=311-1445-1-ND, Tolerance=10%, Voltage Rating=25V, Capacitance=1uF, Case/Package=0603, Category="Ceramic Capacitors", ComponentLink1Description=https://datasheet.ciiva.com/176/mlccorderingcode-176785.pdf?src-supplier=Digi-Key, ComponentLink1URL=https://datasheet.ciiva.com/176/mlccorderingcode-176785.pdf?src-supplier=Digi-Key, ComponentLink2Description=https://datasheet.ciiva.com/176/mlccorderingcode-176786.pdf?src-supplier=Digi-Key, ComponentLink2URL=https://datasheet.ciiva.com/176/mlccorderingcode-176786.pdf?src-supplier=Digi-Key, ComponentLink3Description=https://datasheet.ciiva.com/176/mlccorderingcode-176787.pdf?src-supplier=Digi-Key, ComponentLink3URL=https://datasheet.ciiva.com/176/mlccorderingcode-176787.pdf?src-supplier=Digi-Key, ComponentLink4Description=https://datasheet.ciiva.com/17436/upy-gphc-x5r-4v-to-50v-12-17436952.pdf?src-supplier=Avnet+Europe, ComponentLink4URL=https://datasheet.ciiva.com/17436/upy-gphc-x5r-4v-to-50v-12-17436952.pdf?src-supplier=Avnet+Europe, ComponentLink5Description=https://datasheet.ciiva.com/7978/1525783-7978171.pdf?src-supplier=Element14, ComponentLink5URL=https://datasheet.ciiva.com/7978/1525783-7978171.pdf?src-supplier=Element14, ComponentLink6Description=https://datasheet.ciiva.com/11586/upy-gphc-x5r-4v-to-50v-12-11586318.pdf?src-supplier=Avnet, ComponentLink6URL=https://datasheet.ciiva.com/11586/upy-gphc-x5r-4v-to-50v-12-11586318.pdf?src-supplier=Avnet, Construction=Flat, Depth=0.8mm, Halogen Free="Halogen Free", Height=0.8mm, Item Type=Capacitor, Lead Free="Lead Free", Length=1.6mm, Manufacturer Part Number=CC0603KRX5R8BB105, Mount="Surface Mount", Number of Pins=2, Packaging="Tape and Reel", Pricing 1="1=0.12000, 10=0.08400, 50=0.04760, 100=0.03940, 500=0.02764, 1000=0.02288 (USD)", Radiation Hardening=No, REACH SVHC="No SVHC", RoHS=Yes, RoHS Compliant=Yes, Series=CC, Stock 1=919939, Supplier 1=Digi-Key, Termination=SMD/SMT, Thickness=0.035inch, Voltage Rating (DC)=25V, Width=0.031inch
C9: library part T495D226K035ATE3007280, "CAP TANT 22UF 10% 35V 2917", Case/Package=Molded, ESR (Equivalent Series Resistance)=300mR, LCSC Part Number=C122326, Manufacturer=KEMET, Max Operating Temperature=125°C, Min Operating Temperature=-55°C, Tolerance=10%, ComponentLink1Description=http://components.arrow.com/part/dataview/42155055S8669486N7429?src-supplier=Arrow+Electronics, ComponentLink1URL=http://components.arrow.com/part/dataview/42155055S8669486N7429?src-supplier=Arrow+Electronics, ComponentLink2Description=http://capacitoredge.kemet.com/capedge2/DataSheet?pn=T495D226K035ATE3007280&src-supplier=Avnet, ComponentLink2URL=http://capacitoredge.kemet.com/capedge2/DataSheet?pn=T495D226K035ATE3007280&src-supplier=Avnet, Construction=Flat, Depth=4.3mm, Dissipation Factor=6%, Height=2.8mm, Item Type=Capacitor, Length=7.3mm, Manufacturer Part Number=T495D226K035ATE3007280, Packaging="Tape and Reel", Polarity=Polar, Pricing="2500=0.57649 (USD)", Radiation Hardening=No, RoHS=Yes, RoHS Compliant=Yes, Supplier=Digikey
C11: library part CGA3E2X8R1H473M080AA, "CAP CER 0.047UF 50V X8R 0603", Case Code (Imperial)=0603, Case Code (Metric)=1608, Dielectric=X8R, LCSC Part Number=C2172709, Manufacturer=TDK, Max Operating Temperature=150°C, Min Operating Temperature=-55°C, Package Quantity=4000, Ratings=AEC-Q200, Supplier Part Number 1=445-12603-1-ND, Tolerance=20%, Voltage Rating=50V, Capacitance=47nF, Case/Package=0603, Category="Ceramic Capacitors", ComponentLink1Description=http://www.mouser.com/ds/2/400/mlcc_automotive_hightemp_en-520039.pdf?src-supplier=Mouser, ComponentLink1URL=http://www.mouser.com/ds/2/400/mlcc_automotive_hightemp_en-520039.pdf?src-supplier=Mouser, ComponentLink2Description=https://product.tdk.com/info/en/catalog/spec/mlccspec_automotive_hightemp_en.pdf?src-supplier=Digi-Key, ComponentLink2URL=https://product.tdk.com/info/en/catalog/spec/mlccspec_automotive_hightemp_en.pdf?src-supplier=Digi-Key, ComponentLink3Description=http://product.tdk.com/en/catalog/datasheets/mlcc_automotive_hightemp_en.pdf?src-supplier=Avnet, ComponentLink3URL=http://product.tdk.com/en/catalog/datasheets/mlcc_automotive_hightemp_en.pdf?src-supplier=Avnet, Features="High Temperature", Height=0.8mm, Item Type=Capacitor, Length=0.063inch, Manufacturer Part Number=CGA3E2X8R1H473M080AA, Mount="Surface Mount", Packaging="Tape and Reel", Pricing 1="1=0.16000, 10=0.11200, 50=0.06360, 100=0.05260, 500=0.03690, 1000=0.03055 (USD)", RoHS=Yes, Stock 1=1279, Supplier 1=Digi-Key, Thickness=0.035inch, Voltage Rating (DC)=50V, Weight=7.1E-05oz, Width=0.031inch
C13 C37: library part CC0603KRX7R9BB223, "CAP CER 0.022UF 50V X7R 0603", Case Code (Imperial)=0603, Case Code (Metric)=1608, Dielectric=X7R, Dielectric Material=Ceramic, Insulation Resistance=100GR, LCSC Part Number=C106222, Manufacturer=Yageo, Max Operating Temperature=125°C, Min Operating Temperature=-55°C, Package Quantity=1, Supplier Part Number 1=311-1370-1-ND, Tolerance=10%, Voltage=50V, Capacitance=22nF, Case/Package=0603, Category="Ceramic Capacitors", ComponentLink1Description=https://datasheet.ciiva.com/8033/70765-8033869.pdf?src-supplier=Element14, ComponentLink1URL=https://datasheet.ciiva.com/8033/70765-8033869.pdf?src-supplier=Element14, ComponentLink2Description=https://datasheet.ciiva.com/28450/1489800-28450639.pdf?src-supplier=Element14, ComponentLink2URL=https://datasheet.ciiva.com/28450/1489800-28450639.pdf?src-supplier=Element14, ComponentLink3Description=https://datasheet.ciiva.com/8033/1489800-8033867.pdf?src-supplier=Element14, ComponentLink3URL=https://datasheet.ciiva.com/8033/1489800-8033867.pdf?src-supplier=Element14, ComponentLink4Description=https://datasheet.ciiva.com/8033/1489800-8033865.pdf?src-supplier=Element14, ComponentLink4URL=https://datasheet.ciiva.com/8033/1489800-8033865.pdf?src-supplier=Element14, ComponentLink5Description=https://datasheet.ciiva.com/156/mlccorderingcode-156178.pdf?src-supplier=Digi-Key, ComponentLink5URL=https://datasheet.ciiva.com/156/mlccorderingcode-156178.pdf?src-supplier=Digi-Key, ComponentLink6Description=https://datasheet.ciiva.com/156/mlccorderingcode-156177.pdf?src-supplier=Digi-Key, ComponentLink6URL=https://datasheet.ciiva.com/156/mlccorderingcode-156177.pdf?src-supplier=Digi-Key, ComponentLink7Description=https://datasheet.ciiva.com/156/mlccorderingcode-156179.pdf?src-supplier=Digi-Key, ComponentLink7URL=https://datasheet.ciiva.com/156/mlccorderingcode-156179.pdf?src-supplier=Digi-Key, ComponentLink8Description=https://datasheet.ciiva.com/11464/upy-gphc-x7r-6-3v-to-50v-8-11464741.pdf?src-supplier=Avnet, ComponentLink8URL=https://datasheet.ciiva.com/11464/upy-gphc-x7r-6-3v-to-50v-8-11464741.pdf?src-supplier=Avnet, Depth=0.8mm, Halogen Free="Halogen Free", Height=0.8mm, Item Type=Capacitor, Lead Free="Lead Free", Length=1.6mm, Manufacturer Part Number=CC0603KRX7R9BB223, Mount="Surface Mount", Number of Pins=2, Packaging="Tape and Reel", Pricing 1="1=0.10000, 10=0.05500, 50=0.03020, 100=0.02460, 500=0.01760, 1000=0.01383 (USD)", Radiation Hardening=No, REACH SVHC="No SVHC", Resistor Type=Ceramic, RoHS=Yes, RoHS Compliant=Yes, Series=CC, Stock 1=119735, Supplier 1=Digi-Key, Termination=SMD/SMT, Thickness=0.035inch, Voltage Rating=50V, Voltage Rating (DC)=50V, Width=0.031inch
C14: library part T495D476K025ATE250, "CAP TANT 47UF 10% 25V 2917", LCSC Part Number=C1952924, Manufacturer=KEMET, ComponentLink1Description=http://www.mouser.com/ds/2/212/KEM_T2071_T495_COTS-1104607.pdf?src-supplier=Mouser, ComponentLink1URL=http://www.mouser.com/ds/2/212/KEM_T2071_T495_COTS-1104607.pdf?src-supplier=Mouser, ComponentLink2Description=http://components.arrow.com/part/dataview/43511451S7939771N7429?src-supplier=Arrow+Electronics, ComponentLink2URL=http://components.arrow.com/part/dataview/43511451S7939771N7429?src-supplier=Arrow+Electronics, ComponentLink3Description=https://datasheet.octopart.com/T495D476K025ATE250-Kemet-datasheet-27203288.pdf?src-supplier=Element14, ComponentLink3URL=https://datasheet.octopart.com/T495D476K025ATE250-Kemet-datasheet-27203288.pdf?src-supplier=Element14, ComponentLink4Description=https://datasheet.octopart.com/T495D476K025ATE250-Kemet-datasheet-9873475.pdf?src-supplier=Newark, ComponentLink4URL=https://datasheet.octopart.com/T495D476K025ATE250-Kemet-datasheet-9873475.pdf?src-supplier=Newark, ComponentLink5Description=http://www.kemet.com/Lists/ProductCatalog/Attachments/261/KEM_T2009_T495.pdf?src-supplier=Avnet, ComponentLink5URL=http://www.kemet.com/Lists/ProductCatalog/Attachments/261/KEM_T2009_T495.pdf?src-supplier=Avnet, ComponentLink6Description=https://api.kemet.com/component-edge/download/datasheet/T495D476K025ATE250.pdf?src-supplier=Digikey, ComponentLink6URL=https://api.kemet.com/component-edge/download/datasheet/T495D476K025ATE250.pdf?src-supplier=Digikey, ComponentLink7Description=https://datasheet.octopart.com/T495D476K025ATE250-KEMET-datasheet-102476631.pdf?src-supplier=Farnell, ComponentLink7URL=https://datasheet.octopart.com/T495D476K025ATE250-KEMET-datasheet-102476631.pdf?src-supplier=Farnell, ComponentLink8Description=https://datasheet.octopart.com/T495D476K025ATE250-KEMET-datasheet-130110683.pdf?src-supplier=TME, ComponentLink8URL=https://datasheet.octopart.com/T495D476K025ATE250-KEMET-datasheet-130110683.pdf?src-supplier=TME, Item Type=Capacitor, Manufacturer Part Number=T495D476K025ATE250, Pricing="1=1.82, 10=1.29, 50=1.29, 100=1.07, 1000=0.751, 10000=0.67 (USD)", RoHS=Yes, Stock=2198, Supplier=Mouser
C16 C18 C20 C22: library part CGA0603X5R106K100JT, "10V 10uF X5R ±10% 0603 Multilayer Ceramic Capacitors MLCC - SMD/SMT ROHS", LCSC Part Number=C6119842, Manufacturer=HRE, Package=0603, ComponentLink1Description=LCSC, ComponentLink1URL=https://www.lcsc.com/product-detail/Multilayer-Ceramic-Capacitors-MLCC-SMD-SMT_HRE-CGA0603X5R106K100JT_C6119842.html, Item Type=Capacitor, Manufacturer Part Number=CGA0603X5R106K100JT
C31 C32 C38 C39 C40 C46: library part C3216X5R1E226MTJ00N, "Multilayer Ceramic Capacitor, 22 uF, 25 V, ± 20%, X5R, 1206 [3216 Metric]", Case Code (Imperial)=1206, Case Code (Metric)=3216, Dielectric=X5R, Dielectric Material=4241ConductorMaterial, Manufacturer=TDK, Manufacturer Part Number=C3216X5R1E226M160AB, Max Operating Temperature=85°C, Min Operating Temperature=-55°C, Package Quantity=1, Supplier Part Number=445-6000-1-ND, Tolerance=20%, Voltage Rating=25V, Case/Package=1206, Category="Ceramic Capacitors", ComponentLink1Description=https://datasheet.ciiva.com/24216/c3216x5r1e226m160ab-265194-24216564.pdf?src-supplier=Mouser, ComponentLink1URL=https://datasheet.ciiva.com/24216/c3216x5r1e226m160ab-265194-24216564.pdf?src-supplier=Mouser, ComponentLink2Description=https://datasheet.ciiva.com/6285/tdkmlcccaprange-6285575.pdf?src-supplier=Digikey, ComponentLink2URL=https://datasheet.ciiva.com/6285/tdkmlcccaprange-6285575.pdf?src-supplier=Digikey, ComponentLink3Description=https://datasheet.ciiva.com/6285/tdkmlcccaprange-6285573.pdf?src-supplier=Digikey, ComponentLink3URL=https://datasheet.ciiva.com/6285/tdkmlcccaprange-6285573.pdf?src-supplier=Digikey, Construction=Flat, Depth=1.6mm, Height=1.6mm, Lead Free=5697LeadFree, Length=3.2mm, Material=4241ConductorMaterial, Mounting Technology="Surface Mount", Packaging="Tape and Reel", Pricing="1=0.8, 10=0.557, 50=0.4692, 100=0.3821, 500=0.3184, 1000=0.26813 (USD)", Reach SVHC Compliant=Unknown, RoHS=Yes, RoHS Compliant=Yes, Series=C, Stock=21443, Supplier=Digikey, Termination=SMD/SMT, Thickness=0.071inch, Voltage Rating (DC)=25V, Weight=0.000571oz, Width=0.063inch
C34: library part CC0603KRX5R6BB106, "CAP CER 10UF 10V X5R 0603", Case Code (Imperial)=0603, Case Code (Metric)=1608, Dielectric=X5R, LCSC Part Number=C326057, Manufacturer=Yageo, Max Operating Temperature=85°C, Min Operating Temperature=-55°C, Package Quantity=4000, Resistor Type=Ceramic, Supplier Part Number 1=311-1782-1-ND, Tolerance=10%, Voltage Rating=10V, Capacitance=10uF, Case/Package=0603, Category="Ceramic Capacitors", ComponentLink1Description=http://www.mouser.com/ds/2/447/Yageo_UPY-GP_NP0_16V-to-50V_9-358835.pdf?src-supplier=Mouser, ComponentLink1URL=http://www.mouser.com/ds/2/447/Yageo_UPY-GP_NP0_16V-to-50V_9-358835.pdf?src-supplier=Mouser, ComponentLink2Description=http://www.yageo.com/documents/recent/UPY-GPHC_X5R_4V-to-50V_25.pdf?src-supplier=Digi-Key, ComponentLink2URL=http://www.yageo.com/documents/recent/UPY-GPHC_X5R_4V-to-50V_25.pdf?src-supplier=Digi-Key, Depth=0.8mm, Halogen Free="Halogen Free", Item Type=Capacitor, Lead Free="Lead Free", Length=0.063inch, Manufacturer Part Number=CC0603KRX5R6BB106, Mount="Surface Mount", Packaging="Tape and Reel", Pricing 1="1=0.24000, 10=0.16300, 50=0.09780, 100=0.08260, 500=0.05654, 1000=0.05001 (USD)", RoHS=Yes, RoHS Compliant=Yes, Stock 1=187515, Supplier 1=Digi-Key, Termination=SMD/SMT, Thickness=0.035inch, Voltage Rating (DC)=10V, Weight=7.1E-05oz, Width=0.031inch
C35 C42: library part CC0603KRX5R7BB475, "CAP CER 4.7UF 16V X5R 0603", Case Code (Imperial)=0603, Case Code (Metric)=1608, Dielectric=X5R, LCSC Part Number=C277476, Manufacturer=Yageo, Max Operating Temperature=85°C, Min Operating Temperature=-55°C, Resistor Type=Ceramic, Supplier Part Number 1=311-1785-1-ND, Tolerance=10%, Voltage Rating=16V, Capacitance=4.7uF, Case/Package=0603, Category="Ceramic Capacitors", ComponentLink1Description=http://www.mouser.com/ds/2/447/UPY-GPHC_X5R_4V-to-50V_25-1131599.pdf?src-supplier=Mouser, ComponentLink1URL=http://www.mouser.com/ds/2/447/UPY-GPHC_X5R_4V-to-50V_25-1131599.pdf?src-supplier=Mouser, ComponentLink2Description=http://www.yageo.com/documents/recent/UPY-GPHC_X5R_4V-to-50V_25.pdf?src-supplier=Digi-Key, ComponentLink2URL=http://www.yageo.com/documents/recent/UPY-GPHC_X5R_4V-to-50V_25.pdf?src-supplier=Digi-Key, Depth=0.8mm, Halogen Free="Halogen Free", Height=0.8mm, Item Type=Capacitor, Lead Free="Lead Free", Length=1.6mm, Manufacturer Part Number=CC0603KRX5R7BB475, Mount="Surface Mount", Packaging="Tape and Reel", Pricing 1="1=0.20000, 10=0.13800, 50=0.08280, 100=0.06990, 500=0.04784, 1000=0.04233 (USD)", RoHS=Yes, RoHS Compliant=Yes, Series=CC, Stock 1=547703, Supplier 1=Digi-Key, Termination=SMD/SMT, Thickness=0.037inch, Voltage Rating (DC)=16V, Weight=7.1E-05oz, Width=0.8mm